# Allegro board Mic_Array_main_250pcs_release_updated.brd
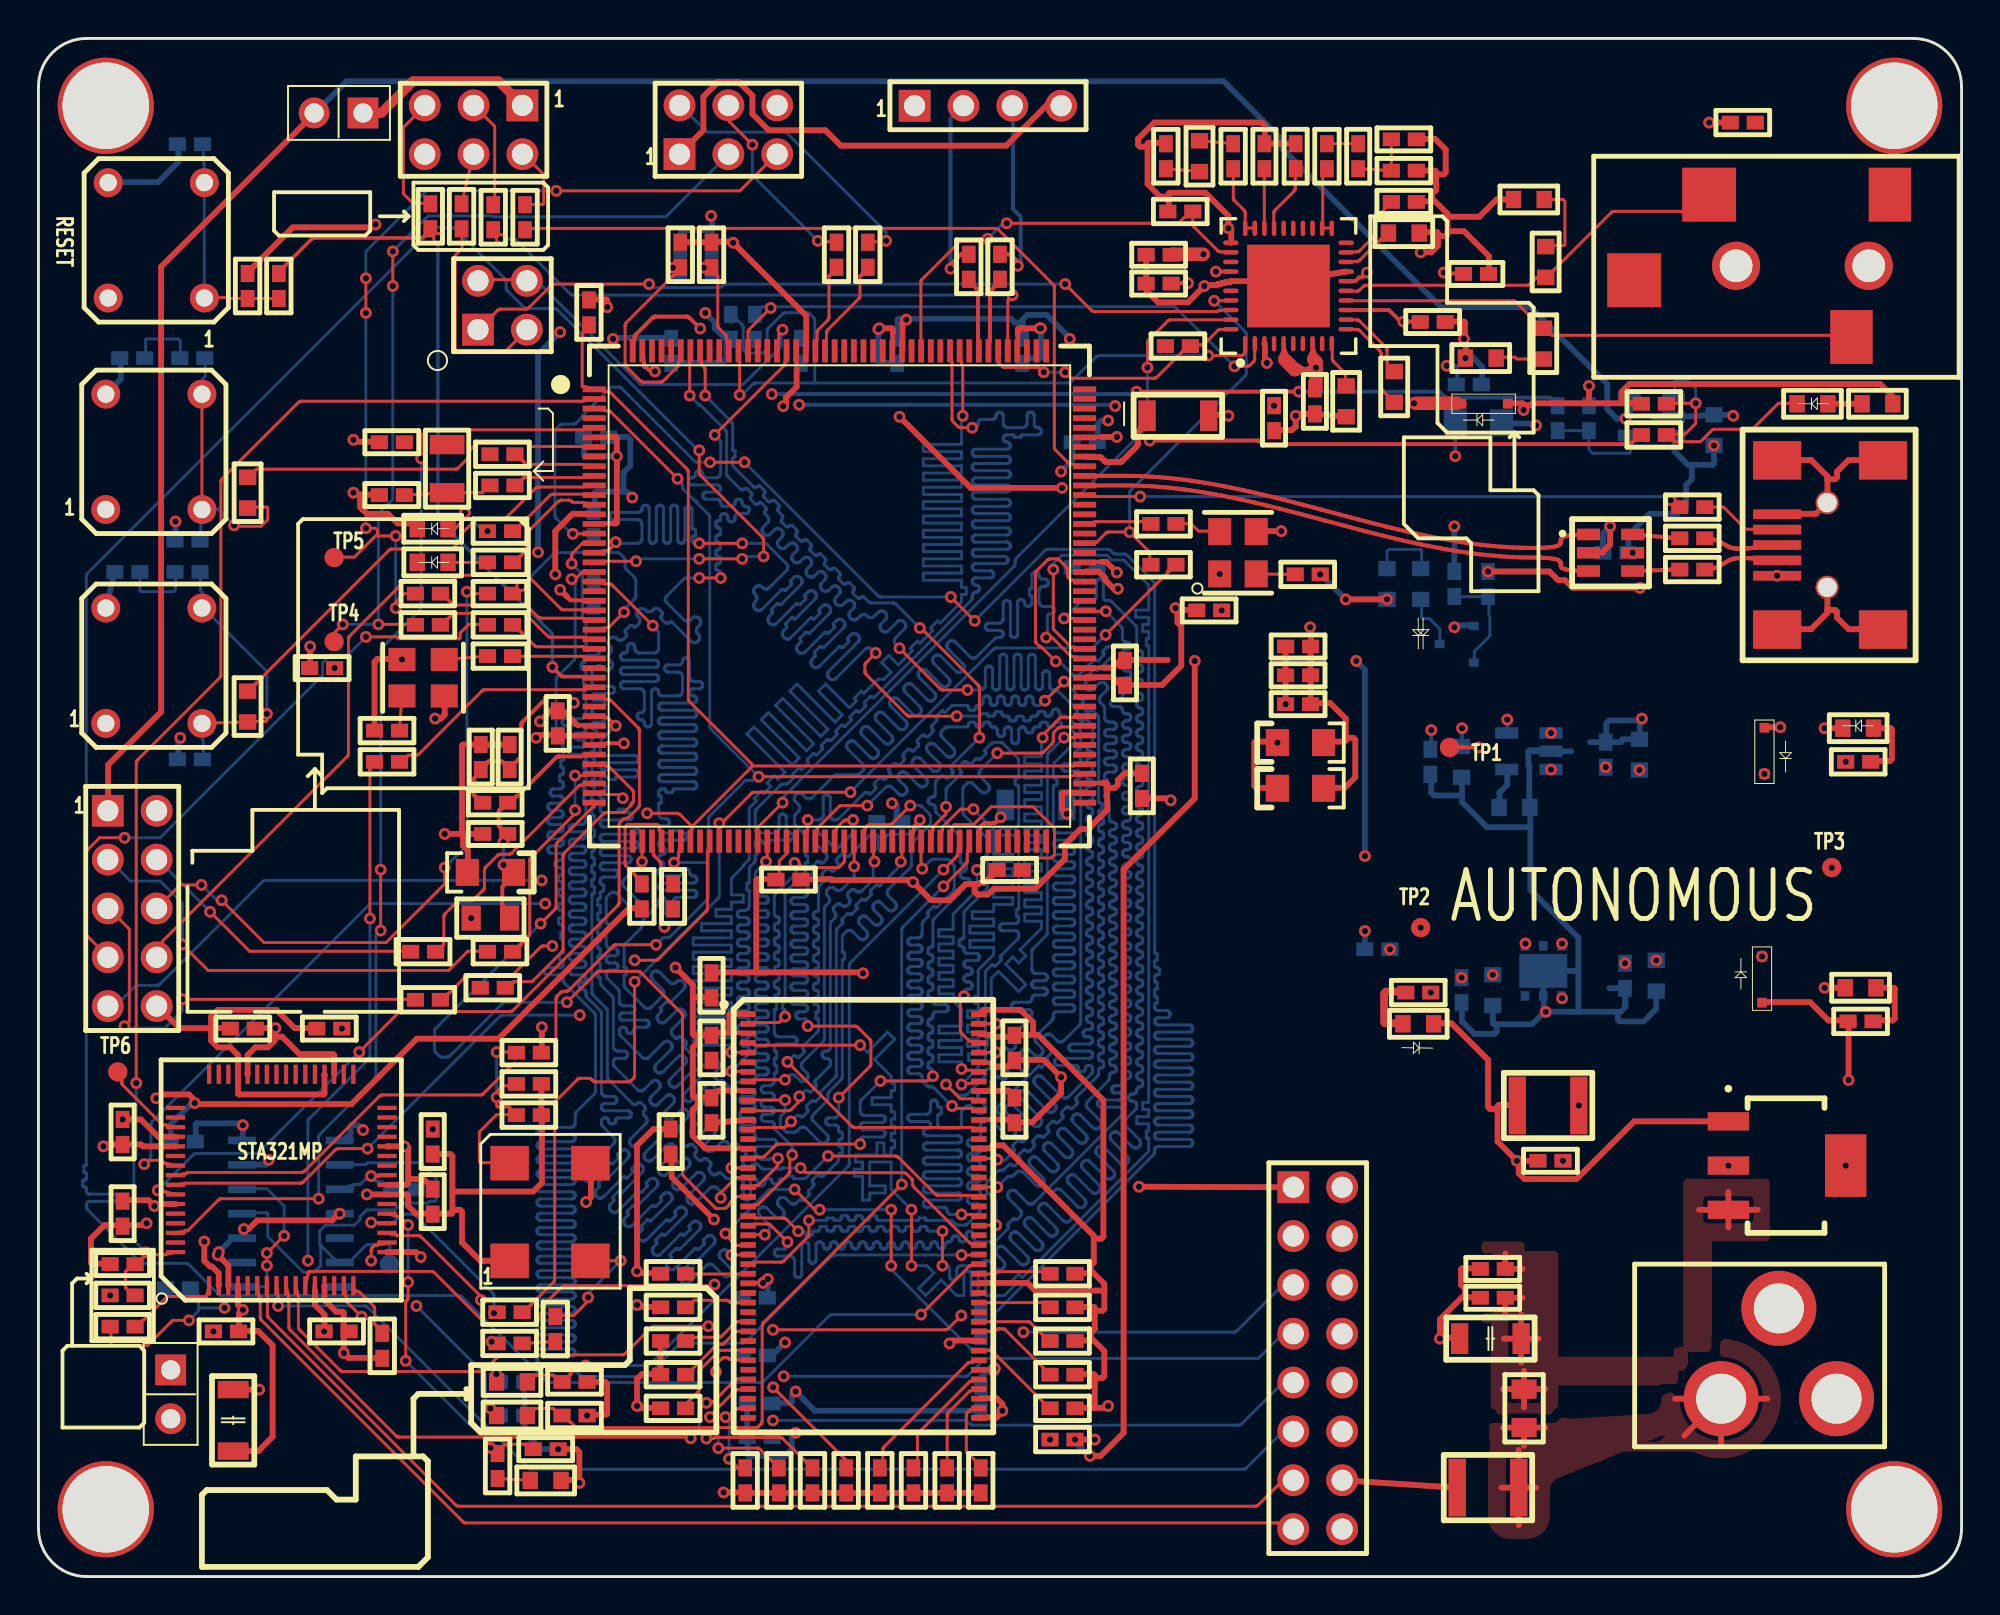
[diagram p0: board, top side]
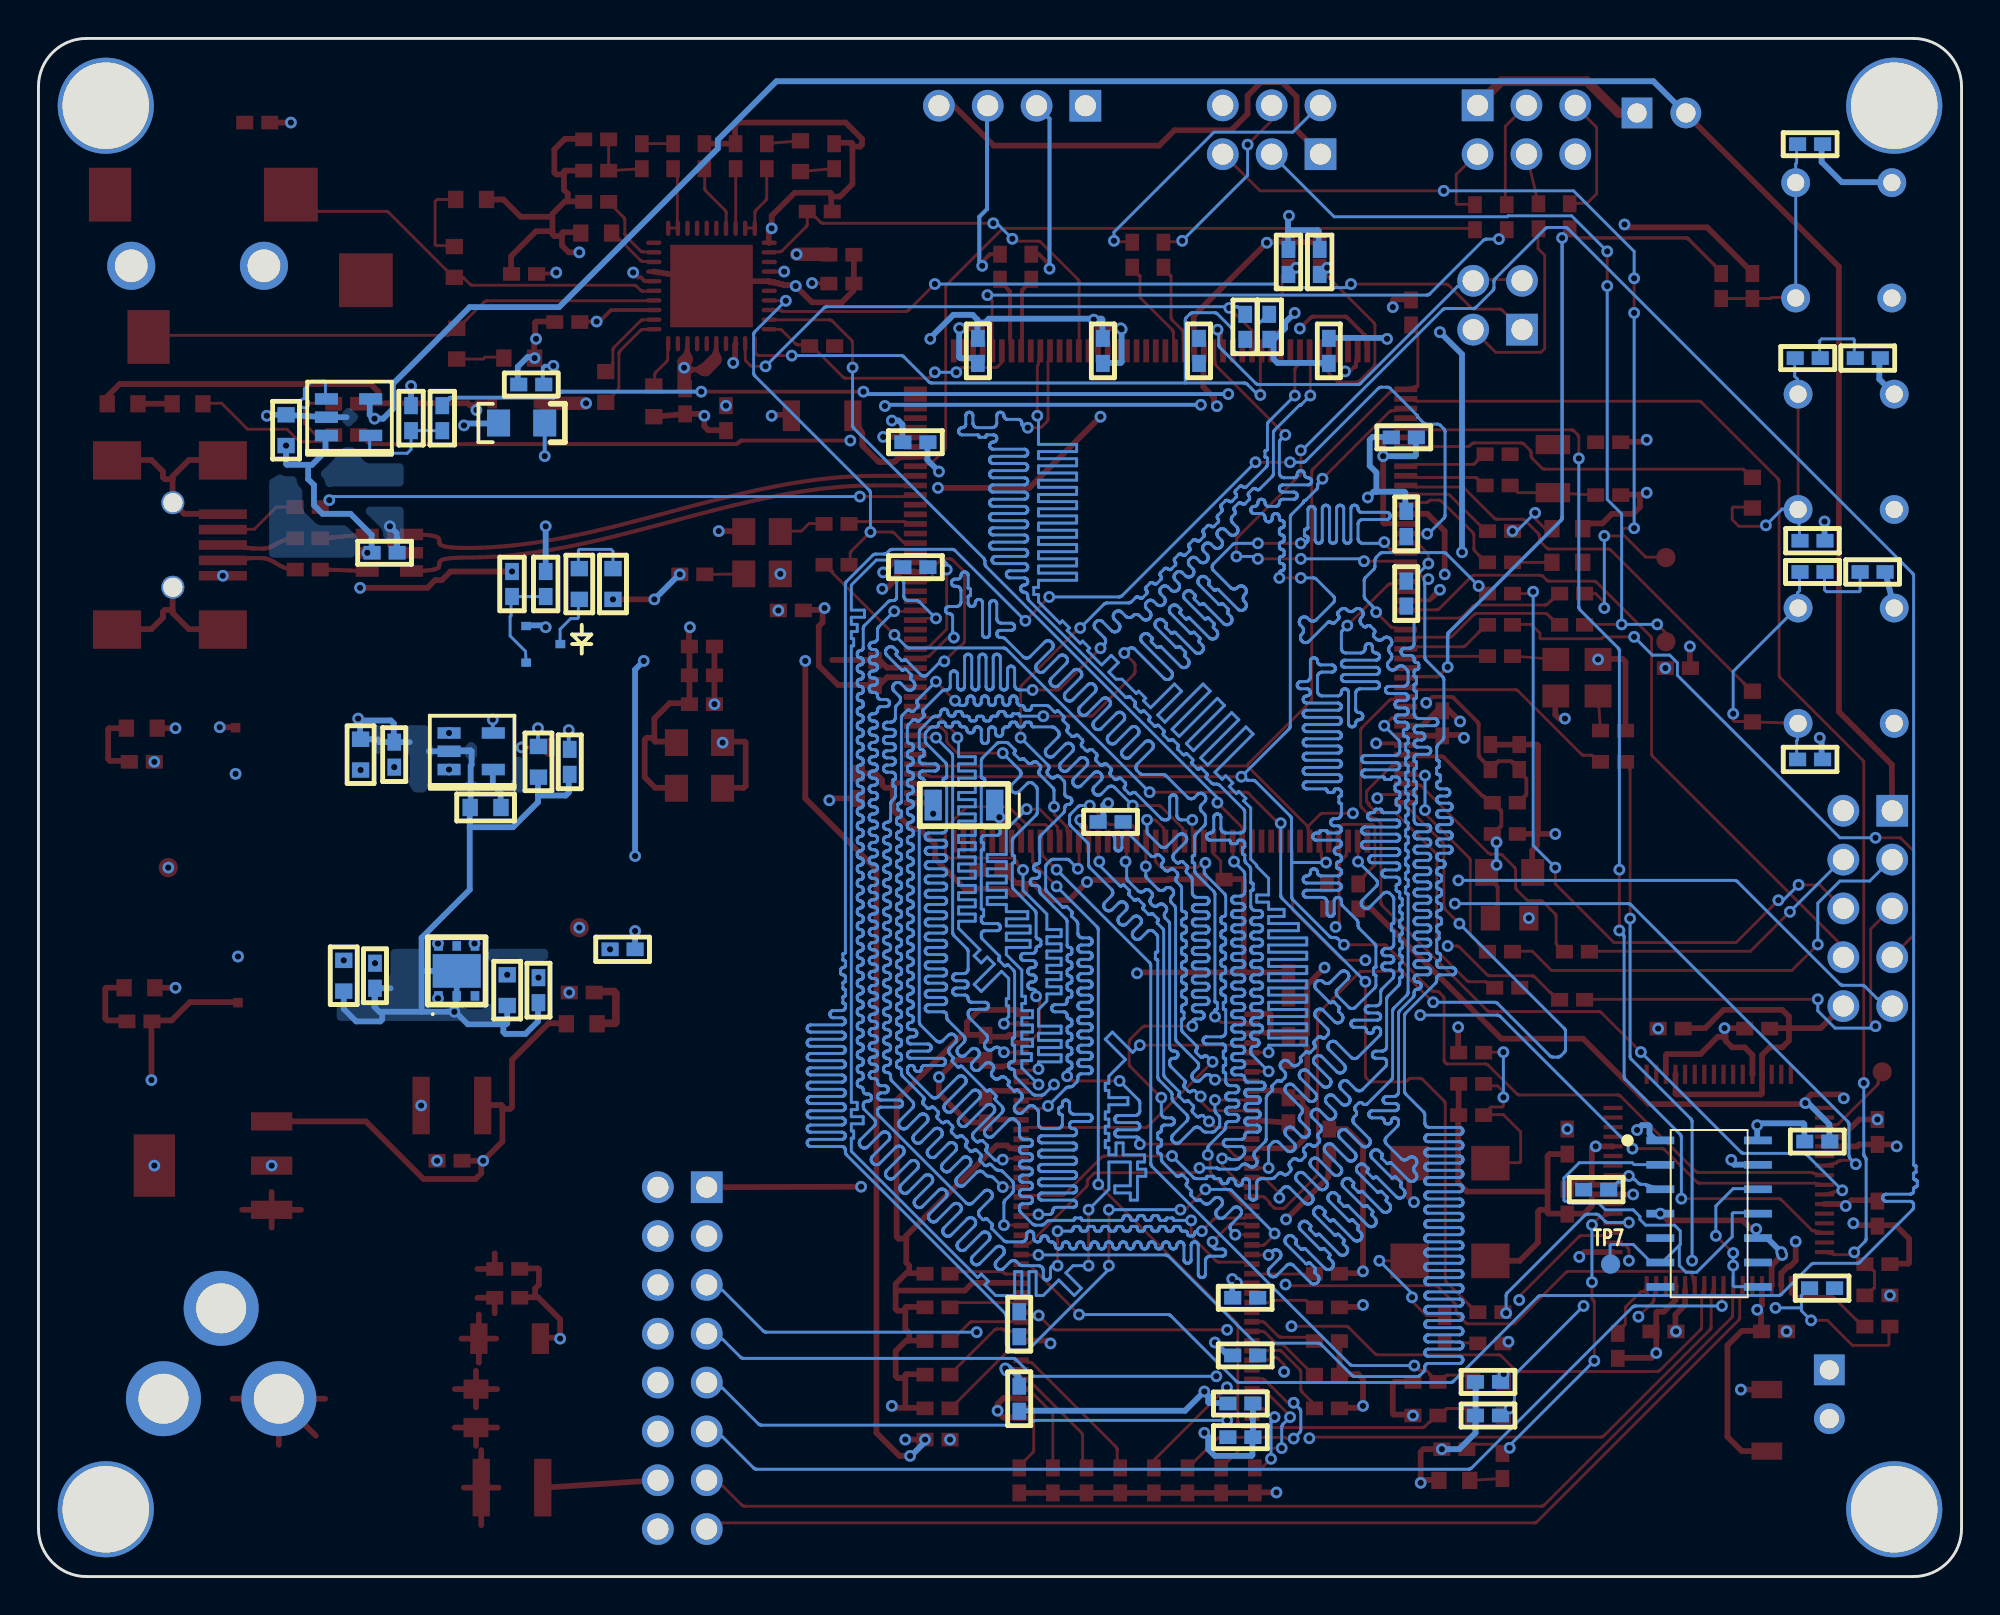
[diagram p1: board, bottom side, seen from below]

Outline 100 x 80 mm; copper layers: TOP, INT_LAYER2, INT_LAYER3, BOTTOM. Coordinates in mm from the lower left corner of the outline.

## Design rules (mm)
constraint set DEFAULT: min track width 0.1
net group PWR_SIGNAL: nets VDDA VREF
net group SDRAM_ADDRESS: nets FMC_A10 FMC_SDCLK
net group UART_DIFF: nets UART4_RX UART4_TX
net group USB_DIFF: nets USB_FS1_N USB_FS1_P
net group USB_OTG_FS: nets USB_OTG_FS_DM USB_OTG_FS_DP
net group SDRAM_DATA: nets FMC_D0 FMC_D1 FMC_D2 FMC_D3 FMC_D4 FMC_D5 FMC_D6 FMC_D7 FMC_D8 FMC_D9 FMC_D10 FMC_D11 FMC_D12 FMC_D13 FMC_D14 FMC_D15
nets with their own width: min track width 0.14; nets OSC25M OSC32_IN OSC32_OUT
nets with their own width: min track width 0.18; nets NRST
nets with their own width: nets OTG_FS_OVERCURRENT OTG_FS_POWERSWITCHON

## Placement (name value [footprint] x y rotation side)
C1  100nF_0402  [CAP_SMD_0402]  7.75 52.25 0 bottom
C2  10pF_0603  [CAP_SMD_0402]  24.62 10.12 0 bottom
C3  10pF_0603  [CAP_SMD_0402]  24.62 8.38 180 bottom
C4  100nF_0402  [CAP_SMD_0402]  8 63.38 0 bottom
C5  100nF_0402  [CAP_SMD_0402]  7.88 74.5 180 bottom
C7  1uF_0603  [CAP_SMD_0603]  83.25 42.75 90 bottom
C8  1uF_0603  [CAP_SMD_0603]  74 42.38 270 bottom
C9  100nF_0402  [CAP_SMD_0402]  81.5 42.75 90 bottom
C10  10nF_0603  [CAP_SMD_0603]  76.75 40 0 bottom
C11  100nF_0402  [CAP_SMD_0402]  72.38 42.38 270 bottom
C12  1uF_0603  [CAP_SMD_0603]  84.12 31.25 270 bottom
C13  100nF_0402  [CAP_SMD_0402]  74 30.5 270 bottom
C14  4.7uF_0603  [CAP_SMD_0603]  87.12 59.62 90 bottom
C15  100nF_0402  [CAP_SMD_0402]  82.5 31.25 270 bottom
C16  1uF_0603  [CAP_SMD_0603]  75.62 30.5 270 bottom
C17  100nF_0402  [CAP_SMD_0402]  82 53.25 0 bottom
C18  330uF_1210  [CAP_SMD_1210]  75.38 4.62 180 top
C19  150uF_1206  [CAP_SMD_1206]  75.5 12.38 180 top
C20  0.1uF_0402  [CAP_SMD_0402]  75.62 16 180 top
C21  10uF_0402  [CAP_SMD_0402]  75.62 14.5 180 top
C22  0.1uF_0402  [CAP_SMD_0402]  78.62 21.62 180 top
C23  22uF_1210  [CAP_SMD_1210]  78.5 24.5 180 top
C24  4.7pF 0402  [CAP_SMD_0402]  18.38 59 0 top
C25  4.7pF 0402  [CAP_SMD_0402]  18.38 56.25 0 top
C26  100nF_0402  [CAP_SMD_0402]  14.75 47.25 0 top
C27  100nF_0402  [CAP_SMD_0402]  65.5 46.88 0 top
C28  100nF_0402  [CAP_SMD_0402]  65.5 48.38 0 top
C29  100nF_0402  [CAP_SMD_0402]  65.5 45.38 0 top
C30  100nF_0402  [CAP_SMD_0402]  44.25 39.25 180 bottom
C31  100nF_0402  [CAP_SMD_0402]  32.9 63.75 90 bottom
C32  100nF_0402  [CAP_SMD_0402]  39.65 63.75 90 bottom
C33  100nF_0402  [CAP_SMD_0402]  28.88 54.75 90 bottom
C34  100nF_0402  [CAP_SMD_0402]  27 44.38 270 top
C35  100nF_0402  [CAP_SMD_0402]  28.88 51.12 90 bottom
C36  100nF_0402  [CAP_SMD_0402]  29 59.25 0 bottom
C37  100nF_0402  [CAP_SMD_0402]  44.65 63.75 90 bottom
C38  100nF_0402  [CAP_SMD_0402]  39 36.25 180 top
C39  100nF_0402  [CAP_SMD_0402]  50.5 36.75 0 top
C40  100nF_0402  [CAP_SMD_0402]  51.15 63.75 90 bottom
C41  100nF_0402  [CAP_SMD_0402]  33 35.38 270 top
C42  100nF_0402  [CAP_SMD_0402]  57.38 41.12 270 top
C43  100nF_0402  [CAP_SMD_0402]  56.5 47 270 top
C44  100nF_0402  [CAP_SMD_0402]  54.4 52.5 0 bottom
C45  100nF_0402  [CAP_SMD_0402]  54.4 59 0 bottom
C46  2.2uF  [CAP_SMD_1206]  59.25 60.38 0 top
C47  2.2uF  [CAP_SMD_1206]  51.88 40.12 180 bottom
C48  4.7uF  [CAP_SMD_1206_TANTALUM]  65.62 43.38 0 top
C49  4.7uF  [CAP_SMD_1206_TANTALUM]  65.62 41 0 top
C50  1uF  [CAP_SMD_1206_TANTALUM]  23.5 36.62 180 top
C51  100nF_0402  [CAP_SMD_0402]  23.75 38.62 0 top
C52  100nF_0402  [CAP_SMD_0402]  24.5 42.62 90 top
C53  100nF_0402  [CAP_SMD_0402]  23 42.62 90 top
C54  0.022uF_0603  [CAP_SMD_0603]  78.25 64.12 90 top
C55  0.022uF_0603  [CAP_SMD_0603]  78.38 68.38 270 top
C56  0.1uF_0402  [CAP_SMD_0402]  64.25 60.25 90 top
C57  0.1uF_0402  [CAP_SMD_0402]  66.38 61.12 90 top
C58  1uF_0603  [CAP_SMD_0603]  68 61.12 270 top
C59  1uF_0603  [CAP_SMD_0603]  70.5 61.88 90 top
C60  1uF_0603  [CAP_SMD_0603]  60.38 73.88 270 top
C61  10nF_ 0402  [CAP_SMD_0402]  71 74.75 180 top
C62  0.1uF_0402  [CAP_SMD_0402]  58.25 67.25 180 top
C63  0.1uF_0402  [CAP_SMD_0402]  74.75 67.75 0 top
C64  1uF_typeA  [CAP_SMD_1206_TANTALUM]  74.88 60 0 bottom
C65  0.1uF_0402  [CAP_SMD_0402]  72.5 65.25 0 top
C66  0.1uF_0402  [CAP_SMD_0402]  74.38 62 0 bottom
C67  0.1uF_0402  [CAP_SMD_0402]  68.62 73.88 270 top
C68  0.1uF_0402  [CAP_SMD_0402]  58.25 68.75 180 top
C69  100nF_0402  [CAP_SMD_0402]  35 27.5 90 top
C70  100nF_0402  [CAP_SMD_0402]  37.5 7.25 180 bottom
C71  100nF_0402  [CAP_SMD_0402]  37.5 9 180 bottom
C72  1uF_0603  [CAP_SMD_0603]  71 69.88 0 top
C73  150pF_0402  [CAP_SMD_0402]  65.38 73.88 90 top
C74  150pF_0402  [CAP_SMD_0402]  63.75 73.88 90 top
C75  1uF_0402  [CAP_SMD_0402]  71 71.5 0 top
C76  100nF_0402  [CAP_SMD_0402]  37.25 11.5 0 bottom
C77  100nF_0402  [CAP_SMD_0402]  37.25 14.5 0 bottom
C78  100nF_0402  [CAP_SMD_0402]  49 9.25 90 bottom
C79  100nF_0402  [CAP_SMD_0402]  49 13.12 90 bottom
C80  100nF_0402  [CAP_SMD_0402]  35 30.75 270 top
C81  100nF_0402  [CAP_SMD_0402]  50.75 27.5 270 top
C82  100nF_0402  [CAP_SMD_0402]  35 24.25 90 top
C83  100nF_0402  [CAP_SMD_0402]  32.88 22.62 270 top
C84  100nF_0402  [CAP_SMD_0402]  50.75 24.25 270 top
C85  100nF_0402  [CAP_SMD_0402]  9.75 12.75 0 top
C86  100nF_0402  [CAP_SMD_0402]  15.12 28.5 0 top
C87  100nF_0402  [CAP_SMD_0402]  20.5 19.5 90 top
C88  100nF_0402  [CAP_SMD_0402]  20.5 22.62 90 top
C89  1nF_0402  [CAP_SMD_0402]  4.38 16.25 180 top
C90  100nF_0402  [CAP_SMD_0402]  10.62 28.5 0 top
C91  100nF_0402  [CAP_SMD_0402]  4.38 23.12 90 top
C92  100nF_0402  [CAP_SMD_0402]  4.38 18.88 90 top
C93  100nF_0402  [CAP_SMD_0402]  15.5 12.75 0 top
C100  10uF_6.3V_1206  [CAP_SMD_1206]  10.12 8.12 270 top
C101  0.01uF_0603  [CAP_SMD_0402]  60.88 50.25 0 top
C102  100nF_0402  [CAP_SMD_0402]  7.5 22.62 0 bottom
C103  100nF_0402  [CAP_SMD_0402]  26.38 6.62 180 top
C104  1nF_0603  [CAP_SMD_0603]  26.38 5 180 top
CN1  JACK 3.5MM  [AUDIO_JACK_35]  86.88 71.88 180 top
D1  LED,red  [LED_SMD_0603]  92.25 61 0 top
D2  LED, green  [LED_SMD_0603]  71.75 28.75 180 top
D3  LED, green  [LED_SMD_0603]  94.75 30.62 0 top
D4  BAT60JFILM  [DIOD_SOD323]  89.75 41.75 90 top
D5  LED, green  [LED_SMD_0603]  71.88 51.62 90 bottom
D6  LED, green  [LED_SMD_0603]  94.62 44.12 0 top
D7  BAT60JFILM  [DIOD_SOD323]  89.62 32.25 270 top
D8  LED, green  [LED_SMD_0603]  20.5 54.5 0 top
D9  LED, green  [LED_SMD_0603]  20.5 52.75 0 top
D10  BAT60JFILM  [DIOD_SOD323]  74 61 0 top
J1  CONN_10POS  [10PINDUALMALEHEADER]  3.6 39.83 270 top
J2  HEADER 6  [6PINDUALMALEHEADER]  25.16 76.52 180 top
J3  CONN_4POS  [4PINFEMALEHEADER]  45.56 76.5 0 top
J5  HEADER 6  [6PINDUALMALEHEADER]  33.34 73.98 0 top
J6  IDC_16_2.54mm  [16PINDUALMALEHEADER]  65.25 20.25 270 top
JP1  JUMPER  [J1_2_254]  6.88 10.75 270 top
JP2  JUMPER2  [4PINDUALMALEHEADER]  22.86 64.86 0 top
JP3  JUMPER_2  [J1_2_254]  16.88 76.12 180 top
L1  1uH  [IN_SMD_0805_2]  77.25 8.75 90 top
L2  FCM1608KF-601T03  [IN_SMD_0805_2]  23.5 34.25 0 top
NOREF  -  [unnamed]  0 0 0 top
NOREF#2  -  [#2]  54.65 38 90 top
Q1  9013-SOT23  [SOT23]  73.75 48.5 180 bottom
R1  22_0402  [RES_SMD_0402]  25.3 70.7 270 top
R2  22_0402  [RES_SMD_0402]  23.65 70.7 270 top
R3  100_0402  [RES_SMD_0402]  4.62 52.25 180 bottom
R4  22_0402  [RES_SMD_0402]  22 70.75 270 top
R5  22_0402  [RES_SMD_0402]  20.38 70.75 270 top
R7  330_0603  [RES_SMD_0603]  10.88 45.25 270 top
R8  100_0402  [RES_SMD_0402]  50 68.12 90 top
R9  220K_0402  [RES_SMD_0402]  7.88 42.5 180 bottom
R10  100_0402  [RES_SMD_0402]  48.38 68.12 90 top
R11  100_0402  [RES_SMD_0402]  4.88 63.38 180 bottom
R12  100_0603  [RES_SMD_0603]  24.62 10.12 180 top
R13  100_0603  [RES_SMD_0603]  24.62 8.38 0 top
R14  100K_0402  [RES_SMD_0402]  10.88 67.12 270 top
R16  0_0402  [RES_SMD_0402]  12.5 67.12 270 top
R18  330_0603  [RES_SMD_0603]  10.88 56.38 270 top
R19  220K_0402  [RES_SMD_0402]  7.75 53.88 180 bottom
R20  620_0603  [RES_SMD_0603]  95.62 61 180 top
R21  47K_0402  [RES_SMD_0402]  84 61 0 top
R22  10K_0402  [RES_SMD_0402]  80.62 60.25 270 bottom
R23  0_0402  [RES_SMD_0402]  84 59.38 180 top
R24  1K_0402  [RES_SMD_0402]  71.75 30.38 0 top
R25  0_0402  [RES_SMD_0402]  79 60.25 270 bottom
R26  22_0402  [RES_SMD_0402]  86 52.38 180 top
R27  22_0402  [RES_SMD_0402]  86 54 180 top
R28  0_0402  [RES_SMD_0402]  86 55.62 180 top
R29  1K_0402  [RES_SMD_0402]  94.75 28.88 180 top
R30  47K_0402  [RES_SMD_0402]  75.38 51.62 270 bottom
R31  330 _0603  [RES_SMD_0603]  70.12 51.62 90 bottom
R32  1K_0402  [RES_SMD_0402]  94.62 42.38 180 top
R33  100K_0402  [RES_SMD_0402]  73.62 51.62 270 bottom
R34  0  [RES_SMD_0402]  24.12 58.38 0 top
R35  0  [RES_SMD_0402]  24.12 56.75 0 top
R36  10K_0402  [RES_SMD_0402]  18.12 44 0 top
R37  0  [RES_SMD_0402]  23.62 30.62 0 top
R40  0  [RES_SMD_0402]  24 32.5 0 top
R41  0  [RES_SMD_0402]  20 32.5 0 top
R43  0  [RES_SMD_0402]  20.25 30 0 top
R44  100  [RES_SMD_0402]  43.12 68.75 90 top
R46  100  [RES_SMD_0402]  41.5 68.75 90 top
R49  100_0402  [RES_SMD_0402]  24 47.88 0 top
R52  10K_ 0402  [RES_SMD_0402]  35 68.75 90 top
R53  N.A  [RES_SMD_0402]  35 68.38 90 bottom
R54  100_0402  [RES_SMD_0402]  20.25 51.12 180 top
R55  10K_0402  [RES_SMD_0402]  31.38 35.38 270 top
R56  100_0402  [RES_SMD_0402]  20.25 49.5 180 top
R57  NA  [RES_SMD_0402]  33.38 68.75 90 top
R59  10K_0402  [RES_SMD_0402]  33.38 68.38 90 bottom
R61  0  [RES_SMD_0402]  24 51.12 180 top
R63  0  [RES_SMD_0402]  24 49.5 180 top
R64  1K  [RES_SMD_0402]  24 54.38 0 top
R65  1K  [RES_SMD_0402]  24 52.75 0 top
R66  0  [RES_SMD_0402]  69.62 32.62 0 bottom
R67  0  [RES_SMD_0402]  23.75 40.25 0 top
R68  100K_0402  [RES_SMD_0402]  53.25 14 180 top
R69  10K_0402  [RES_SMD_0402]  53.25 12.25 180 top
R70  10K_0402  [RES_SMD_0402]  53.25 10.5 180 top
R71  10K_0402  [RES_SMD_0402]  53.25 8.75 180 top
R72  10K_0402  [RES_SMD_0402]  43.75 5 90 top
R73  10K_0402  [RES_SMD_0402]  45.5 5 90 top
R74  10K_0402  [RES_SMD_0402]  47.25 5 90 top
R75  51_0603  [RES_SMD_0603]  75 63.38 0 top
R76  51_0603  [RES_SMD_0603]  77.5 71.62 0 top
R77  10K_0402  [RES_SMD_0402]  49 5 90 top
R78  10K_0402  [RES_SMD_0402]  36.75 5 90 top
R79  10K_0402  [RES_SMD_0402]  38.5 5 90 top
R80  10K_0402  [RES_SMD_0402]  40.25 5 90 top
R81  10K_0402  [RES_SMD_0402]  42 5 90 top
R82  10K_0402  [RES_SMD_0402]  33 8.75 0 top
R83  10K_0402  [RES_SMD_0402]  33 10.5 0 top
R84  0_0402  [RES_SMD_0402]  88.62 75.62 0 top
R85  10K_0402  [RES_SMD_0402]  33 12.25 0 top
R86  10K_0402  [RES_SMD_0402]  33 14 0 top
R87  10K_0402  [RES_SMD_0402]  59.38 71 0 top
R88  100_0402  [RES_SMD_0402]  62.12 73.88 90 top
R89  0_0402  [RES_SMD_0402]  59.25 64 0 top
R90  100K_0402  [RES_SMD_0402]  53.25 15.75 0 top
R91  100K_0402  [RES_SMD_0402]  33 15.75 180 top
R92  100K_0402  [RES_SMD_0402]  58.62 73.88 90 top
R93  100K_0402  [RES_SMD_0402]  71 73.12 0 top
R94  100K_0402  [RES_SMD_0402]  67 73.88 90 top
R95  N.A 0  [RES_SMD_0402]  58.5 52.62 0 top
R96  10K_0402  [RES_SMD_0402]  4.38 14.62 0 top
R97  2K7_0402  [RES_SMD_0402]  37.25 65 270 bottom
R98  2K7_0402  [RES_SMD_0402]  36 65 270 bottom
R99  10K_0402  [RES_SMD_0402]  25.5 24 180 top
R100  100_0402  [RES_SMD_0402]  26.88 12.88 270 top
R101  0R0_0402(N.A)  [RES_SMD_0402]  25.5 27.25 0 top
R102  0R0_0402  [RES_SMD_0402]  25.5 25.62 0 top
R103  0R0_0402(NA)  [RES_SMD_0402]  24.5 12.12 0 top
R104  0R0_0402  [RES_SMD_0402]  24.5 13.75 0 top
R105  0R0_0402(NA)  [RES_SMD_0402]  4.38 13 180 top
R106  0R0_0402(NA)  [RES_SMD_0402]  7.25 15 180 bottom
R107  0R0_0402  [RES_SMD_0402]  19 20.12 0 bottom
R110  0_0603  [RES_SMD_0402]  53.25 7.12 0 top
R111  10K_0402  [RES_SMD_0402]  66 52.12 180 top
R112  3K3_0402  [RES_SMD_0402]  23.88 5.75 90 top
R114  0R0_0402  [RES_SMD_0402]  17.88 12 90 top
R115  100_0402  [RES_SMD_0402]  58.5 54.75 180 top
R116  2K7_0402  [RES_SMD_0402]  27.88 10.12 0 top
R117  2K7_0402  [RES_SMD_0402]  27.88 8.38 0 top
R118  0  [RES_SMD_0402]  18.12 42.38 180 top
R119  10k_0402(NA)  [RES_SMD_0402]  28.62 65.75 270 top
SW1  SW-BLACK  [PUSHBUTTON_4_09]  6 47.38 90 top
SW2  SW-BLACK  [PUSHBUTTON_4_09]  6 58.5 90 top
SW3  SW-BLACK  [PUSHBUTTON_4_09]  6.12 69.5 270 top
TP1  TEST POINT  [TEST_PAD1]  73.38 43.12 0 top
TP2  TEST POINT  [TEST_PAD1]  71.88 33.75 0 top
TP3  TEST POINT  [TEST_PAD1]  93.25 36.88 0 top
TP4  TEST POINT  [TEST_PAD1]  15.38 48.62 0 top
TP5  TEST POINT  [TEST_PAD1]  15.38 53 0 top
TP6  TEST POINT  [TEST_PAD1]  4.12 26.25 0 top
TP7  TEST POINT  [TEST_PAD1]  18.25 16.25 180 bottom
U1  LD3985M25R  [SOT235L]  77.5 42.88 90 bottom
U2  LD39050PU33R  [DFN6_6_3X3]  78.25 31.5 180 bottom
U4  Mini USB Type B  [MINI_USB]  93.01 53.65 90 top
U5  USBLC6-2  [SOT23_6L]  81.75 53.25 270 top
U6  PJ-202A  [DC-JACK]  87.5 9.25 270 top
U7  LT1117IST-5PBF  [SOT_223]  90.88 21.38 270 top
U8  STM32F746IGT6  [LQFP_176_24X24]  41.65 51 0 top
U9  CS43L22  [QFN_40_6X6]  65 67.12 90 top
U10  MT48LC4M32B2  [TSOPII_86_22X12]  42.9 18.75 0 top
U11  STMPS2141STR  [SOT235L]  83.88 60.25 90 bottom
U12  STA321MPL  [STA321]  8.88 15.62 0 top
U14  -  [74VHC74]  13.12 18.88 180 bottom
X1  NX3215SA-32.768K  [XTAL_32MHZ]  21.25 57.62 90 top
X2  OSC MEMS 25Mhz CMOS SMD  [OSC14REC12]  20 46.75 0 top
X3  OSC 12.2888MHZ  [OSC14REC12]  62.38 53.25 90 top
X4  OSC 12.2888MHZ  [OSC112896]  24.5 21.5 270 top

## Library data of the parts
C1-C5 C7-C17 C20-C47 C51-C53 C85-C93 C101-C104 = CAPACITOR NON-POL
C18 C19 = C
C48-C50 C64 C100 = CAPACITOR POL_0
C54-C63 C65-C84 = CAP NP
CN1 = ST-225-02_3
D1-D3 D5 D6 D8 D9 = LED
D4 D7 D10 = DIODE
J1 = HEADER 5X2
J2 J5 = HEADER 6_0
J3 = 4 HEADER
J6 = CON16A
JP1 JP3 = JUMPER_2
JP2 = JUMPER2
L1 = INDUCTOR
L2 = L
Q1 = PN2222
R1-R5 R7-R11 R14 R16 R18-R37 R40 R41 R43 R44 R46 R49 R53-R57 R59 R61 R63-R74 R77-R83 R85 R86 R90 R91 R95 R97 R98 R110 R111 R115-R119 = R2
R12 R13 R75 R76 R84 R87-R89 R92-R94 R96 R99-R107 R112 R114 = R
R52 = R2_0
SW1 = SW PUSHBUTTON-SPST-2/SM_1
SW2 = SW PUSHBUTTON-SPST-2/SM_2
SW3 = SW PUSHBUTTON-SPST-2/SM_0
TP1-TP7 = TEST POINT
U1 = LD3985M33R_2
U2 = LD39050PU33R_1
U4 = USB_7
U5 = USBLC6-2_4
U6 = DC JACK: User Part Number: ***
U7 = LT1117IST-5PBF_1
U8 = STM32F746xxx_15
U9 = 40L QFN_2
U10 = SDRAM-MT48LC4M32B2_0
U11 = STMPS2141STR_2
U12 = STA321MPL_0
U14 = 7474_0
X1 = QZS32768
X2 X3 = OSC4/SM_2
X4 = XTAL_0

## Footprints (pads in the part's own frame, mm; a bottom-side part is the same pattern mirrored in y, then rotated)
4PINDUALMALEHEADER
  rect 1.65x1.65 hole 1.1: 1(0,0)
  round 1.65 hole 1.1: 2(0,2.54) 3(2.54,0) 4(2.54,2.54)
4PINFEMALEHEADER
  rect 1.65x1.65 hole 1.1: 1(0,0)
  round 1.65 hole 1.1: 2(2.54,0) 3(5.08,0) 4(7.62,0)
6PINDUALMALEHEADER
  rect 1.65x1.65 hole 1.1: 1(0,0)
  round 1.65 hole 1.1: 2(0,2.54) 3(2.54,0) 4(2.54,2.54) 5(5.08,0) 6(5.08,2.54)
10PINDUALMALEHEADER
  rect 1.65x1.65 hole 1.1: 1(0,0)
  round 1.65 hole 1.1: 2(0,2.54) 3(2.54,0) 4(2.54,2.54) 5(5.08,0) 6(5.08,2.54) 7(7.62,0) 8(7.62,2.54) 9(10.16,0) 10(10.16,2.54)
16PINDUALMALEHEADER
  rect 1.65x1.65 hole 1.1: 1(0,0)
  round 1.65 hole 1.1: 2(0,2.54) 3(2.54,0) 4(2.54,2.54) 5(5.08,0) 6(5.08,2.54) 7(7.62,0) 8(7.62,2.54) 9(10.16,0) 10(10.16,2.54) 11(12.7,0) 12(12.7,2.54) 13(15.24,0) 14(15.24,2.54) 15(17.78,0) 16(17.78,2.54)
74VHC74
  rect 1.45x0.4 smd: 1(-2.54,3.81) 2(-2.54,2.54) 3(-2.54,1.27) 4(-2.54,0) 5(-2.54,-1.27) 6(-2.54,-2.54) 7(-2.54,-3.81) 8(2.54,-3.81) 9(2.54,-2.54) 10(2.54,-1.27) 11(2.54,0) 12(2.54,1.27) 13(2.54,2.54) 14(2.54,3.81)
AUDIO_JACK_35
  round 2.5 hole 1.7 unplated: (-8.3,3.7) (-1.4,3.7)
  rect 2.2x2.8 smd: 1(-9.4,0) 3(-7.4,7.4)
  rect 2.8x2.8 smd: 2(0,0) 4(3.9,4.45)
CAP_SMD_0402
  rect 0.889x0.711 smd: 1(-0.65,0) 2(0.65,0)
CAP_SMD_0603
  rect 0.8x0.9 smd: 1(-0.8,0) 2(0.8,0)
CAP_SMD_1206
  rect 0.9x1.6 smd: 1(-1.6,0) 2(1.6,0)
CAP_SMD_1206_TANTALUM
  rect 1.2x1.4 smd: 1(-1.2,0) 2(1.2,0)
CAP_SMD_1210
  rect 0.9x3 smd: 1(-1.6,0) 2(1.6,0)
DC-JACK
  round 3.9 hole 2.6: 1(0,0) 2(0,6) 3(-4.7,3)
DFN6_6_3X3
  rect 0.45x0.5 smd: 1(-0.95,-1.3) 2(0,-1.3) 3(0.95,-1.3) 4(0.95,1.3) 5(0,1.3) 6(-0.95,1.3)
  rect 2.5x1.75 smd: 7(0,0)
DIOD_SOD323
  rect 0.5x0.5 smd: 1(0,0) 2(2.4,0)
IN_SMD_0805_2
  rect 1x1.3 smd: 1(-1,0) 2(1,0)
J1_2_254
  rect 1.6x1.6 hole 1: 1(0,0)
  round 1.6 hole 1: 2(2.54,0)
LED_SMD_0603
  rect 0.8x0.9 smd: 1(-0.8,0) 2(0.8,0)
LQFP_176_24X24
  rect 1.2x0.3 smd: 1(-12.75,10.75) 2(-12.75,10.25) 3(-12.75,9.75) 4(-12.75,9.25) 5(-12.75,8.75) 6(-12.75,8.25) 7(-12.75,7.75) 8(-12.75,7.25) 9(-12.75,6.75) 10(-12.75,6.25) 11(-12.75,5.75) 12(-12.75,5.25) 13(-12.75,4.75) 14(-12.75,4.25) 15(-12.75,3.75) 16(-12.75,3.25) 17(-12.75,2.75) 18(-12.75,2.25) 19(-12.75,1.75) 20(-12.75,1.25) 21(-12.75,0.75) 22(-12.75,0.25) 23(-12.75,-0.25) 24(-12.75,-0.75) 25(-12.75,-1.25) 26(-12.75,-1.75) 27(-12.75,-2.25) 28(-12.75,-2.75) 29(-12.75,-3.25) 30(-12.75,-3.75) 31(-12.75,-4.25) 32(-12.75,-4.75) 33(-12.75,-5.25) 34(-12.75,-5.75) 35(-12.75,-6.25) 36(-12.75,-6.75) 37(-12.75,-7.25) 38(-12.75,-7.75) 39(-12.75,-8.25) 40(-12.75,-8.75) 41(-12.75,-9.25) 42(-12.75,-9.75) 43(-12.75,-10.25) 44(-12.75,-10.75) 89(12.75,-10.75) 90(12.75,-10.25) 91(12.75,-9.75) 92(12.75,-9.25) 93(12.75,-8.75) 94(12.75,-8.25) 95(12.75,-7.75) 96(12.75,-7.25) 97(12.75,-6.75) 98(12.75,-6.25) 99(12.75,-5.75) 100(12.75,-5.25) 101(12.75,-4.75) 102(12.75,-4.25) 103(12.75,-3.75) 104(12.75,-3.25) 105(12.75,-2.75) 106(12.75,-2.25) 107(12.75,-1.75) 108(12.75,-1.25) 109(12.75,-0.75) 110(12.75,-0.25) 111(12.75,0.25) 112(12.75,0.75) 113(12.75,1.25) 114(12.75,1.75) 115(12.75,2.25) 116(12.75,2.75) 117(12.75,3.25) 118(12.75,3.75) 119(12.75,4.25) 120(12.75,4.75) 121(12.75,5.25) 122(12.75,5.75) 123(12.75,6.25) 124(12.75,6.75) 125(12.75,7.25) 126(12.75,7.75) 127(12.75,8.25) 128(12.75,8.75) 129(12.75,9.25) 130(12.75,9.75) 131(12.75,10.25) 132(12.75,10.75)
  rect 0.3x1.2 smd: 45(-10.75,-12.75) 46(-10.25,-12.75) 47(-9.75,-12.75) 48(-9.25,-12.75) 49(-8.75,-12.75) 50(-8.25,-12.75) 51(-7.75,-12.75) 52(-7.25,-12.75) 53(-6.75,-12.75) 54(-6.25,-12.75) 55(-5.75,-12.75) 56(-5.25,-12.75) 57(-4.75,-12.75) 58(-4.25,-12.75) 59(-3.75,-12.75) 60(-3.25,-12.75) 61(-2.75,-12.75) 62(-2.25,-12.75) 63(-1.75,-12.75) 64(-1.25,-12.75) 65(-0.75,-12.75) 66(-0.25,-12.75) 67(0.25,-12.75) 68(0.75,-12.75) 69(1.25,-12.75) 70(1.75,-12.75) 71(2.25,-12.75) 72(2.75,-12.75) 73(3.25,-12.75) 74(3.75,-12.75) 75(4.25,-12.75) 76(4.75,-12.75) 77(5.25,-12.75) 78(5.75,-12.75) 79(6.25,-12.75) 80(6.75,-12.75) 81(7.25,-12.75) 82(7.75,-12.75) 83(8.25,-12.75) 84(8.75,-12.75) 85(9.25,-12.75) 86(9.75,-12.75) 87(10.25,-12.75) 88(10.75,-12.75) 133(10.75,12.75) 134(10.25,12.75) 135(9.75,12.75) 136(9.25,12.75) 137(8.75,12.75) 138(8.25,12.75) 139(7.75,12.75) 140(7.25,12.75) 141(6.75,12.75) 142(6.25,12.75) 143(5.75,12.75) 144(5.25,12.75) 145(4.75,12.75) 146(4.25,12.75) 147(3.75,12.75) 148(3.25,12.75) 149(2.75,12.75) 150(2.25,12.75) 151(1.75,12.75) 152(1.25,12.75) 153(0.75,12.75) 154(0.25,12.75) 155(-0.25,12.75) 156(-0.75,12.75) 157(-1.25,12.75) 158(-1.75,12.75) 159(-2.25,12.75) 160(-2.75,12.75) 161(-3.25,12.75) 162(-3.75,12.75) 163(-4.25,12.75) 164(-4.75,12.75) 165(-5.25,12.75) 166(-5.75,12.75) 167(-6.25,12.75) 168(-6.75,12.75) 169(-7.25,12.75) 170(-7.75,12.75) 171(-8.25,12.75) 172(-8.75,12.75) 173(-9.25,12.75) 174(-9.75,12.75) 175(-10.25,12.75) 176(-10.75,12.75)
MINI_USB
  rect 0.5x2.5 smd: 1(-1.6,2.6) 2(-0.8,2.6) 3(0,2.6) 4(0.8,2.6) 5(1.6,2.6)
  rect 2x2.5 smd: 6(4.4,2.6) 7(-4.4,2.6) 8(-4.4,-2.9) 9(4.4,-2.9)
  round 1.2 hole 1: 10(2.2,0) 11(-2.2,0)
OSC14REC12
  rect 1.4x1.2 smd: 1(-1.1,-0.95) 2(1.1,-0.95) 3(1.1,0.95) 4(-1.1,0.95)
OSC112896
  rect 1.8x2 smd: 1(0,0) 2(5.08,0) 3(5.08,4.2) 4(0,4.2)
PUSHBUTTON_4_09
  round 1.5 hole 0.9: 1(-3,2.5) 2(-3,-2.5) 3(3,-2.5) 4(3,2.5)
QFN_40_6X6
  oval 0.8x0.23 smd: 1(-3,2.25) 2(-3,1.75) 3(-3,1.25) 4(-3,0.75) 5(-3,0.25) 6(-3,-0.25) 7(-3,-0.75) 8(-3,-1.25) 9(-3,-1.75) 10(-3,-2.25) 21(3,-2.25) 22(3,-1.75) 23(3,-1.25) 24(3,-0.75) 25(3,-0.25) 26(3,0.25) 27(3,0.75) 28(3,1.25) 29(3,1.75) 30(3,2.25)
  oval 0.23x0.8 smd: 11(-2.25,-3) 12(-1.75,-3) 13(-1.25,-3) 14(-0.75,-3) 15(-0.25,-3) 16(0.25,-3) 17(0.75,-3) 18(1.25,-3) 19(1.75,-3) 20(2.25,-3) 31(2.25,3) 32(1.75,3) 33(1.25,3) 34(0.75,3) 35(0.25,3) 36(-0.25,3) 37(-0.75,3) 38(-1.25,3) 39(-1.75,3) 40(-2.25,3)
  rect 4.3x4.3 smd: 41(0,0)
RES_SMD_0402
  rect 0.889x0.711 smd: 1(-0.65,0) 2(0.65,0)
RES_SMD_0603
  rect 0.8x0.9 smd: 1(-0.8,0) 2(0.8,0)
SOT23
  rect 0.508x0.432 smd: 1(-0.889,0.94) 2(-0.889,-0.965) 3(0.889,0)
SOT23_6L
  rect 0.6x1.2 smd: 1(-0.95,-1.15) 2(0,-1.15) 3(0.95,-1.15) 4(0.95,1.15) 5(0,1.15) 6(-0.95,1.15)
SOT235L
  rect 0.6x1.2 smd: 1(-0.9,1.15) 2(0.05,1.15) 3(1,1.15) 4(-0.9,-1.15) 5(1,-1.15)
SOT_223
  rect 0.95x2.15 smd: 1(-2.3,-3) 2(0,-3) 3(2.3,-3)
  rect 3.25x2.15 smd: 4(0,3.1)
STA321
  rect 0.22x1 smd: 1(0,-0.5) 2(0.5,-0.5) 3(1,-0.5) 4(1.5,-0.5) 5(2,-0.5) 6(2.5,-0.5) 7(3,-0.5) 8(3.5,-0.5) 9(4,-0.5) 10(4.5,-0.5) 11(5,-0.5) 12(5.5,-0.5) 13(6,-0.5) 14(6.5,-0.5) 15(7,-0.5) 16(7.5,-0.5) 33(7.5,10.5) 34(7,10.5) 35(6.5,10.5) 36(6,10.5) 37(5.5,10.5) 38(5,10.5) 39(4.5,10.5) 40(4,10.5) 41(3.5,10.5) 42(3,10.5) 43(2.5,10.5) 44(2,10.5) 45(1.5,10.5) 46(1,10.5) 47(0.5,10.5) 48(0,10.5)
  rect 1x0.22 smd: 17(9.25,1.25) 18(9.25,1.75) 19(9.25,2.25) 20(9.25,2.75) 21(9.25,3.25) 22(9.25,3.75) 23(9.25,4.25) 24(9.25,4.75) 25(9.25,5.25) 26(9.25,5.75) 27(9.25,6.25) 28(9.25,6.75) 29(9.25,7.25) 30(9.25,7.75) 31(9.25,8.25) 32(9.25,8.75) 49(-1.75,8.75) 50(-1.75,8.25) 51(-1.75,7.75) 52(-1.75,7.25) 53(-1.75,6.75) 54(-1.75,6.25) 55(-1.75,5.75) 56(-1.75,5.25) 57(-1.75,4.75) 58(-1.75,4.25) 59(-1.75,3.75) 60(-1.75,3.25) 61(-1.75,2.75) 62(-1.75,2.25) 63(-1.75,1.75) 64(-1.75,1.25)
TEST_PAD1
  round 1 smd: 1(0,0)
TSOPII_86_22X12
  rect 0.8x0.3 smd: 1(-6,10.5) 2(-6,10) 3(-6,9.5) 4(-6,9) 5(-6,8.5) 6(-6,8) 7(-6,7.5) 8(-6,7) 9(-6,6.5) 10(-6,6) 11(-6,5.5) 12(-6,5) 13(-6,4.5) 14(-6,4) 15(-6,3.5) 16(-6,3) 17(-6,2.5) 18(-6,2) 19(-6,1.5) 20(-6,1) 21(-6,0.5) 22(-6,0) 23(-6,-0.5) 24(-6,-1) 25(-6,-1.5) 26(-6,-2) 27(-6,-2.5) 28(-6,-3) 29(-6,-3.5) 30(-6,-4) 31(-6,-4.5) 32(-6,-5) 33(-6,-5.5) 34(-6,-6) 35(-6,-6.5) 36(-6,-7) 37(-6,-7.5) 38(-6,-8) 39(-6,-8.5) 40(-6,-9) 41(-6,-9.5) 42(-6,-10) 43(-6,-10.5) 44(6,-10.5) 45(6,-10) 46(6,-9.5) 47(6,-9) 48(6,-8.5) 49(6,-8) 50(6,-7.5) 51(6,-7) 52(6,-6.5) 53(6,-6) 54(6,-5.5) 55(6,-5) 56(6,-4.5) 57(6,-4) 58(6,-3.5) 59(6,-3) 60(6,-2.5) 61(6,-2) 62(6,-1.5) 63(6,-1) 64(6,-0.5) 65(6,0) 66(6,0.5) 67(6,1) 68(6,1.5) 69(6,2) 70(6,2.5) 71(6,3) 72(6,3.5) 73(6,4) 74(6,4.5) 75(6,5) 76(6,5.5) 77(6,6) 78(6,6.5) 79(6,7) 80(6,7.5) 81(6,8) 82(6,8.5) 83(6,9) 84(6,9.5) 85(6,10) 86(6,10.5)
unnamed
  round 5 hole 4.5: (3.5,76.5) (3.5,3.5) (96.5,76.5) (96.5,3.5)
XTAL_32MHZ
  rect 1x1.8 smd: 1(-1.25,0) 2(1.25,0)

## Nets
2.5V: C8.1 C11.1 C62.1 C63.1 C64.1 C65.1 C66.1 TP1.1 U1.5(VOUT) U9.13 U9.16 U9.34
3.3V: C13.1 C16.1 C26.2 C100.1 C101.2 D10.2 J3.4 J5.1 JP1.2 R14.1 R20.1 R21.1 R22.1 R24.2 R31.1 R36.1 R53.2 R59.2 R66.2 R101.2 R110.2 R111.1 R119.1 TP2.1 U2.4(VO) X2.4(VDD) X3.4(VDD)
3.3V DDR: C69.2 C70.2 C71.2 C76.2 C77.2 C78.2 C79.2 C80.2 C81.2 C82.2 C83.2 C84.2 R110.1 U10.1 U10.3 U10.9 U10.15 U10.29 U10.35 U10.41 U10.43 U10.49 U10.55 U10.75 U10.81
3.3V_STA: C85.1 C86.2 C87.2 C88.2 C90.2 C91.2 C92.2 C93.1 C102.2 J6.1 JP1.1 R96.1 U12.3 U12.12 U12.24 U12.28 U12.35 U12.44 U12.52 U12.59 U14.1 U14.4 U14.10 U14.13 U14.14 X4.4
3V: C56.2 C57.2 C68.1 D10.1(K) U9.5 U9.8 U9.33
5V: C7.1 C9.1 C12.1 C15.1 D4.1(K) D7.1(K) J1.1 JP3.2 R32.2 TP3.1 U1.1 U1.3 U2.1 U2.6 U11.5
5V_EXT: C22.1 C23.1 D7.2 R29.2 U7.2(VOUT) U7.4
12V: C18.1 L1.1 U6.1
GND: C2.2 C3.1 C5.2 C7.2 C8.2 C9.2 C10.2 C11.2 C12.2 C13.2 C14.2 C15.2 C16.2 C17.1 C18.2 C19.2 C20.2 C21.2 C22.2 C23.2 C24.1 C25.1 C26.1 C27.2 C28.2 C29.2 C30.2 C31.2 C32.2 C33.2 C34.2 C35.2 C36.2 C37.2 C38.2 C39.2 C40.2 C41.2 C42.2 C43.2 C44.2 C45.2 C46.2 C47.1 C48.2 C49.2 C50.2 C51.1 C52.2 C53.2 C56.1 C57.1 C58.2 C61.1 C62.2 C63.2 C64.2 C65.2 C66.2 C68.2 C69.1 C70.1 C71.1 C72.2 C73.2 C74.2 C75.2 C76.1 C77.1 C78.1 C79.1 C80.1 C81.1 C82.1 C83.1 C84.1 C85.2 C86.1 C87.1 C88.1 C89.2 C90.1 C91.1 C92.1 C93.2 C100.2 C101.1 C102.1 C103.1 C104.1 D2.1(CATHODE) D3.1(CATHODE) D6.1(CATHODE) D8.1(CATHODE) D9.1(CATHODE) J1.10 J2.6 J3.1 J5.6 J6.4 J6.6 J6.8 J6.10 J6.12 J6.14 J6.16 Q1.1(E) R9.2 R19.2 R33.1 R52.2 R55.2 R57.2 R68.1 R69.1 R70.1 R71.1 R72.1 R73.1 R74.1 R75.1 R76.1 R77.1 R78.1 R79.1 R80.1 R81.1 R82.1 R83.1 R84.1 R85.1 R86.1 R87.1 R90.2 R91.2 R92.2 R93.2 R99.1 R102.2 R114.1 SW3.2 SW3.3 U1.2 U2.2 U2.7 U4.5 U4.6 U4.7 U4.8 U4.9 U4.10 U4.11 U5.2 U6.2 U7.1 U8.14 U8.22 U8.37(VSSA) U8.61 U8.71 U8.90 U8.102 U8.113 U8.126 U8.135 U8.148 U8.158 U9.3 U9.17 U9.31 U9.35 U9.41 U10.6 U10.12 U10.32 U10.38 U10.44 U10.46 U10.52 U10.58 U10.72 U10.78 U10.84 U10.86 U11.2 U12.2 U12.4 U12.13 U12.17 U12.23 U12.27 U12.36 U12.45 U12.53 U12.60 U14.7 X2.2 X3.2 X4.2
VCC: J2.1 JP3.1
VDD: C27.1 C28.1 C29.1 C30.1 C31.1 C32.1 C33.1 C34.1 C35.1 C36.1 C37.1 C38.1 C39.1 C40.1 C41.1 C42.1 C43.1 C44.1 C45.1 C48.1 C49.1 L2.1 R3.2 R11.2 R66.1 R97.2 R98.2 R116.2 R117.2 SW1.1 SW1.4 SW2.1 SW2.4 U8.6 U8.15 U8.23 U8.36 U8.49 U8.62 U8.72 U8.82 U8.91 U8.103 U8.114 U8.127 U8.136 U8.149 U8.159 U8.172
VDDA: C50.1 C51.2 L2.2 R67.2 U8.39
BICKO: R119.2 U8.1 U8.51 U8.93 U12.55
CKOUT: R107.1 U12.25 U14.3
CKOUT_4: R105.2 R106.1 U14.8 U14.12
FMC_A0: U8.16 U10.25
FMC_A1: U8.17 U10.26
FMC_A2: U8.18 U10.27
FMC_A3: U8.19 U10.60
FMC_A4: U8.20 U10.61
FMC_A5: U8.21 U10.62
FMC_A6: U8.60 U10.63
FMC_A7: U8.63 U10.64
FMC_A8: U8.64 U10.65
FMC_A9: U8.65 U10.66
FMC_A10: U8.66 U10.24
FMC_A11: U8.67 U10.21
FMC_BA0: U8.108 U10.22
FMC_BA1: U8.109 U10.23
FMC_D0: U8.104 U10.2
FMC_D1: U8.105 U10.4
FMC_D2: U8.142 U10.5
FMC_D3: U8.143 U10.7
FMC_D4: U8.68 U10.8
FMC_D5: U8.69 U10.10
FMC_D6: U8.70 U10.11
FMC_D7: U8.73 U10.13
FMC_D8: U8.74 U10.74
FMC_D9: U8.75 U10.76
FMC_D10: U8.76 U10.77
FMC_D11: U8.77 U10.79
FMC_D12: U8.78 U10.80
FMC_D13: U8.96 U10.82
FMC_D14: U8.97 U10.83
FMC_D15: U8.98 U10.85
FMC_NBL0: U8.169 U10.16
FMC_NBL1: U8.170 U10.71
FMC_SDCKE0: U8.35 U10.67
FMC_SDCLK: U8.112 U10.68
FMC_SDNCAS: U8.160 U10.18
FMC_SDNE0: U8.44 U10.20
FMC_SDNRAS: U8.59 U10.19
FMC_SDNWE: U8.46 U10.17(WE#)
I2C2_SCL: R12.1 R116.1 U8.79
I2C2_SDA: R13.2 R117.1 U8.80
I2S2_CKIN: R115.1 X3.3
LED_USER1: R64.2 U8.12
LED_USER2: R65.2 U8.13
LRCKO: U8.3 U8.50 U8.92 U12.56
MCLK: R95.2 R104.2 U8.54
MIC_CK: J6.3 R106.2 R107.2
MIC_DATA1: J6.5 U12.11
MIC_DATA2: J6.7 U12.10
MIC_DATA3: J6.9 U12.9
MIC_DATA4: J6.11 U12.8
MIC_DATA5: J6.13 U12.7
MIC_DATA6: J6.15 U12.6
NRST: R5.2 R16.1 U8.31
OSC25M: R49.1 X2.3
OSC32_IN: R34.2 U8.9
OSC32_OUT: R35.2 U8.10
OSC_CLK: R100.2 R103.2
OTG_FS_OVERCURRENT: R23.2 U8.176
OTG_FS_POWERSWITCHON: R25.1 U8.175
PA0: J1.2 R37.1
PA1: J1.3 R40.1
PA2: J1.4 R41.1
PA3: J1.5 R43.1
PA15: R89.2 U8.138 U9.40
PB2: U8.58 U9.39
PB3: JP2.1 U9.38
PB6: R97.1 U8.164 U9.2
PB7: R98.1 U8.165 U9.1
PC7: R95.1 U8.116 U9.37
PC10: R8.1 U8.139
PC11: R10.1 U8.140
PC12: U8.141
PD4: R87.2 U8.146 U9.32
PDM_CLK: R105.1 U12.1
PF6: J1.8 U8.24
PF8: J1.6 R61.2
PF10: J1.7 R63.2
PH2: J1.9 U8.43
PI8: R18.1 U8.7
PI9: R7.1 U8.11
PWDN: C89.1 R96.2 U8.2 U12.64
SDO_12: U8.53 U12.57
SDO_34: U8.33 U12.58
SDO_56: U8.5 U12.62
SPI5_CK: J5.5 R54.2 TP5.1
SPI5_MOSI: J5.3 R56.2 TP4.1
SPI6_CK: J5.2 R44.2
SPI6_MOSI: J5.4 R46.2
STA_RESET: R118.2 U12.15
SWCLK: R2.2 U8.137
SWDIO: R1.2 U8.124
SWO: JP2.3 R4.2
U5V_USB: C14.1 C17.2 D4.2 R30.1 U4.1(VCC) U5.5(VBUS) U11.1(OUT)
UART4_RX: J3.2 R10.2
UART4_TX: J3.3 R8.2
USB_FS1_N: R26.1 U4.2
USB_FS1_P: R27.1 U4.3
USB_OTG_FS_DM: U5.3 U8.122
USB_OTG_FS_DP: U5.1 U8.123
USB_OTG_FS_ID: R28.2 U8.121
VREF: C52.1 C53.1 R67.1 U8.38
XTI: R103.1 R104.1 U12.20(XTI)
N115879: C24.2 R34.1 X1.2
N115893: C25.2 R35.1 X1.1
N117103: R36.2 X2.1
N162834: R52.1 R53.1 U8.166
N163230: R57.1 R59.1 U8.171
N206390: JP2.2 JP2.4 U8.161
N226705: C10.1 U1.4
N233294: D2.2 R24.1
N238541: D5.1(CATHODE) Q1.3
N238552: Q1.2 R30.2 R33.2
N238566: D5.2 R31.2
N241763: R26.2 U5.4
N241767: R27.2 U5.6
N242760: R28.1 U4.4
N248007: C55.2 CN1.2 U9.15
N248035: C54.2 CN1.3 U9.14
N248189: CN1.1 R84.2
N248225: R88.1 U9.29 U9.30
N248229: C60.1 R88.2
N248233: C60.2 R89.1 R92.1
N248303: C58.1 U9.10
N248307: C59.1 U9.11
N248311: C59.2 U9.12
N248571: C54.1 R75.2
N248575: C55.1 R76.2
N248601: R94.1 U9.21 U9.22
N248611: C67.1 R94.2
N248615: C61.2 C67.2 R93.1
N248679: C75.1 U9.19(VQ)
N248687: C74.1 U9.28
N248695: C73.1 U9.27
N248703: C72.1 U9.18
N260798: C46.1 U8.125
N260805: C47.2 U8.81
N264179: D1.1(CATHODE) R21.2 R23.1 U11.3
N264257: D1.2 R20.2
N265526: R22.2 R25.2 U11.4
N266142: D6.2 R32.1
N294693: R55.1 U8.48
N298204: R49.2 U8.29
N307670: R54.1 U8.25
N313164: R40.2 U8.41
N313168: R41.2 U8.42
N313176: R43.2 U8.47
N314492: R61.1 U8.26
N314496: R56.1 U8.27
N314500: R63.1 U8.28
N343193: R37.2 U8.40
N345423: C1.2 R7.2 R9.1 SW1.2 SW1.3
N345707: C1.1 R3.1
N346106: C4.2 R18.2 R19.1 SW2.2 SW2.3
N346154: C4.1 R11.1
N347566: D8.2 R64.1
N347570: D9.2 R65.1
N380637: C19.1 C20.1 C21.1 L1.2 U7.3
N384702: D3.2 R29.1
N392150: C5.1 R14.2 R16.2 SW3.1 SW3.4
N398183: C2.1 R12.2 U12.19
N398229: C3.2 R13.1 U12.18
N401733: R44.1 U8.156
N401749: R46.1 U8.157
N404005: R90.1 U10.59
N404009: R91.1 U10.28
N414682: R85.2 U10.33
N414689: R83.2 U10.34
N414717: R82.2 U10.36
N414729: R81.2 U10.37
N414741: R80.2 U10.39
N414753: R79.2 U10.40
N414765: R78.2 U10.42
N414777: R77.2 U10.45
N414789: R74.2 U10.47
N414891: R86.2 U10.31
N414986: R73.2 U10.48
N414998: R72.2 U10.50
N415010: R71.2 U10.51
N415031: R70.2 U10.53
N415042: R69.2 U10.54
N415068: R68.2 U10.56
N500901: J2.2 R1.1
N500913: J2.3 R2.1
N500925: J2.4 R4.1
N500937: J2.5 R5.1
N801153: R99.2 R101.1 R102.1 X4.1
N801177: R100.1 X4.3
N846467: R111.2 X3.1
N856976: TP6.1 U12.51
N860674: C103.2 R112.2 U12.21
N860799: C104.2 R112.1
N867055: R114.2 U12.16
N892239: R115.2 U8.118
N898566: TP7.1 U14.2 U14.6(Q\1\) U14.11
N941023: R118.1 U8.32

Pads without a net: CN1 4; J6 2; U2 3 5; U6 3; U8 4 8 30 34 45 52 55 56 57 83 84 85 86 87 88 89 94 95 99 100 101 106 107 110 111 115 117 119 120 128 129 130 131 132 133 134 144 145 147 150 151 152 153 154 155 162 163 167 168 173 174; U9 4 6 7 9 20 23 24 25 26 36; U10 14 30 57 69 70 73; U12 5 14 22 26 29 30 31 32 33 34 37 38 39 40 41 42 43 46 47 48 49 50 54 61 63; U14 5 9

## Via types
v1: diameter 0.61, hole 0.33, TOP to BOTTOM, 423 vias

## Routing (per net, layer and track width the routed paths; a pad name or vN(x,y) marks a point on that pad's centre or on a via; arc(x,y) is an arc through that point)
2.5V: length 34.9
  TOP w0.2: C63.1 74.08,67.78 73.12,67.78 v1(73.08,67.83) ; 74,43.12 C8.1 ; 74,43.12 v1(74.88,43.12) ; 74,43.12 73.47,43.12 73.38,43.12 TP1.1 ; U9.34 62,67.87 61.98,67.88 v1(61.23,67.88) ; C62.1 58.98,67.28 v1(59.77,67.28) ; U9.16 68,67.37 68.08,67.38 68.47,67.38 68.67,67.58 68.83,67.58 v1(69.08,67.83) ; U9.13 68,65.87 68.08,65.88 70.22,65.88 70.83,65.28 v1(70.97,65.28) 71.83,65.28 C65.1
  INT_LAYER3 w0.3: 72.97,58.27 72.58,58.27 69.28,54.98 69.28,46.88 ; 71.08,43.92 71.08,47.48 71.47,47.88 71.97,47.88 72.42,47.42 72.42,46.48
  BOTTOM w0.2: C11.1 72.38,43.03 72.42,43.12 v1(72.42,44.02) ; C66.1 73.73,62 73.78,62.08 73.78,62.88 73.67,62.98 v1(73.22,62.98) ; v1(74.03,44.12) 74.03,43.27 74,43.18 C8.1 ; C64.1 v1(73.67,58.27) ; v1(76.38,44.58) 76.38,43.98 76.35,43.88 U1.5
3.3V: length 283.1
  TOP w0.3: v1(53.9,7.12) v1(54.92,7.12) ; v1(17.52,70.33) 17.38,70.17 13.22,70.17 10.93,67.88 10.88,67.77 R14.1 ; D10.2 76.47,61.02 77.17,61.02 77.22,60.98 77.22,60.92 ; J5.1 33.34,73.98 33.38,74.03 34.58,75.22 34.58,76.97 35.33,77.72 36.42,77.72 37.12,77.03 37.12,76.08 37.98,75.22 40.92,75.22 41.73,74.42 50.33,74.42 52.42,76.53 53.18,76.5 J3.4 ; v1(11.47,9.72) 10.18,9.72 10.12,9.72 C100.1 ; R119.1 28.62,66.4 28.68,66.42 29.52,66.42 29.57,66.38 v1(29.57,66.03) ; v1(60.12,47.62) 60.12,40.48 56.42,36.77 56.42,7.47 55.23,6.28 v1(54.67,6.28) ; v1(44.77,60.33) 48.48,56.62 v1(53.23,56.62) ; 77.22,60.92 77.58,60.92 77.67,61.02 80.62,61.02 ; 77.22,60.92 v1(77.22,60.67) ; 80.62,61.02 82.33,61.02 ; 80.62,61.02 v1(80.62,61.92) ; 82.33,61.02 82.33,61.62 82.72,62.02 95.78,62.02 96.42,61.38 96.42,61 R20.1 ; 82.33,61.02 83.33,61.02 R21.1 ; R36.1 17.47,44 17.48,44.08 17.48,47.58 17.62,47.73 18.93,47.73 v1(18.9,47.7) ; v1(26.18,28.57) 26.18,27.32 R101.2 ; v1(70.12,50.83) v1(67.97,50.83)
  INT_LAYER3 w0.3: v1(27.12,64.72) 27.02,64.72 26.93,64.83 26.93,65.62 ; v1(53.23,56.62) 53.48,56.88 58.12,56.88 58.27,56.73 ; 32.06,72.7 J5.1 ; J5.1 33.34,72.7 ; J5.1 34.61,75.26 ; J5.1 32.06,73.98 ; 12.38,41.17 13.53,40.02 13.53,17.43 13.28,17.18 13.28,11.53 v1(11.47,9.72) ; v1(77.22,60.67) 77.22,60.08 73.97,56.83 71.83,56.83 ; v1(25.98,53.27) 25.98,50.98 23.73,48.73 21.57,48.73 21.48,48.83 ; 68.17,28.18 54.92,14.93 v1(54.92,7.12) ; v1(26.18,28.57) 24.12,30.62 24.12,36.08 21.82,38.38 21.82,41.17 ; 23.12,52.38 23.12,50.92 22.32,50.12 21.48,50.12 20.82,50.77 20.82,51.58 ; 38.73,65.53 39.58,65.53 v1(44.77,60.33) ; 22.68,40.67 22.68,41.17 22.07,41.77 21.57,41.77 21.18,41.38 21.18,40.62 ; v1(17.52,70.33) 18.32,70.33 20.02,68.62 26.68,68.62 27.88,67.42
  BOTTOM w0.3: R53.2 35,69.03 35.02,69.12 35.02,70.03 ; v1(34.98,70.78) 35.02,70.72 35.02,70.03 ; v1(25.98,53.27) 25.98,63.58 v1(27.12,64.72) ; v1(68.97,37.48) 68.97,47.17 v1(68.53,47.62) ; v1(66.65,52.12) 66.67,52.12 v1(67.97,50.83) ; U2.4 77.3,32.8 v1(77.33,32.92) ; R59.2 33.38,69.03 33.42,69.12 33.42,69.97 33.48,70.03 35.02,70.03 ; v1(80.62,61.92) 80.62,60.98 80.62,60.9 R22.1 ; v1(54.67,6.28) 54.62,6.28 53.92,6.97 53.92,7.08 v1(53.9,7.12)
  vias: v1(15.4,47.25) v1(61.42,52.15) v1(61.53,50.25) v1(70.28,32.62) v1(71.88,33.75) v1(72.4,30.38) v1(74,31.15) v1(75.62,31.3)
3.3V DDR: length 49.3
  TOP w0.2: U10.81 48.98,26.73 49.42,26.73 49.48,26.68 49.52,26.68 49.62,26.57 ; 36.38,22.27 36.88,22.27 U10.15 ; 49.42,10.78 48.98,10.78 U10.49 ; U10.29 36.98,15.28 37.42,15.28 ; 36.38,28.27 36.88,28.27 U10.3 ; 36.38,25.27 36.88,25.27 U10.9 ; 49.42,23.77 48.98,23.77 U10.75
  TOP w0.215: 36.33,25.27 36.38,25.27 ; 36.33,22.27 36.38,22.27 ; 36.33,28.27 36.38,28.27 ; 49.48,23.77 49.42,23.77 ; 37.48,15.28 37.42,15.28 ; 49.48,10.78 49.42,10.78
  TOP w0.218: 49.67,26.57 49.62,26.57
  TOP w0.23: 36.27,22.27 36.33,22.27 ; 37.52,15.28 37.48,15.28 ; 36.27,28.27 36.33,28.27 ; 36.27,25.27 36.33,25.27 ; 49.52,23.77 49.48,23.77 ; 49.52,10.78 49.48,10.78
  TOP w0.233: 49.73,26.57 49.67,26.57
  TOP w0.245: 36.23,25.27 36.27,25.27 ; 49.58,23.77 49.52,23.77 ; 49.58,10.78 49.52,10.78 ; 36.23,28.27 36.27,28.27 ; 37.58,15.28 37.52,15.28 ; 36.23,22.27 36.27,22.27
  TOP w0.251: 49.77,26.52 49.73,26.57
  TOP w0.26: 49.62,23.77 49.58,23.77 ; 36.17,25.27 36.23,25.27 ; 37.62,15.28 37.58,15.28 ; 36.17,28.27 36.23,28.27 ; 36.17,22.27 36.23,22.27 ; 49.62,10.78 49.58,10.78
  TOP w0.269: 49.83,26.52 49.77,26.52
  TOP w0.275: 36.12,25.27 36.17,25.27 ; 36.12,22.27 36.17,22.27 ; 36.12,28.27 36.17,28.27 ; v1(37.67,15.28) 37.62,15.28 ; 49.67,23.77 49.62,23.77
  TOP w0.278: v1(49.67,10.72) 49.62,10.78
  TOP w0.284: 49.88,26.52 49.83,26.52
  TOP w0.29: 49.73,23.77 49.67,23.77 ; 36.08,22.27 36.12,22.27 ; 36.08,28.27 36.12,28.27 ; 36.08,25.27 36.12,25.27
  TOP w0.299: 49.92,26.52 49.88,26.52
  TOP w0.3: 34.02,30.12 34.02,30.77 v1(33.12,31.68) ; 34.02,30.12 34.98,30.12 C80.2 ; 34.02,30.12 34.02,28.23 34.08,28.18 34.27,28.18 ; 34.27,28.18 34.98,28.18 C69.2 35.12,28.27 35.92,28.27 ; 34.27,28.18 34.27,27.77 34.02,27.52 34.02,24.98 34.08,24.93 34.27,24.93 ; 34.27,24.93 34.98,24.93 C82.2 35.38,25.27 36.08,25.27 ; 34.27,24.93 34.27,24.52 34.02,24.27 34.02,22.93 34.67,22.27 36.08,22.27 ; 35.92,28.27 36.08,28.27 ; 35.92,28.27 35.92,29.23 35.98,29.27 36.88,29.27 U10.1 ; 49.73,23.77 50.62,23.77 C84.2 50.83,23.62 51.67,23.62 53.17,25.12 v1(53.17,25.98) 52.27,26.88 50.83,26.88 C81.2 50.42,26.52 49.92,26.52 ; v1(35.12,18.57) 32.92,20.77 32.92,21.93 C83.2
  INT_LAYER3 w0.15: 38.52,19.82 38.52,19.23 38.73,19.02
  INT_LAYER3 w0.2: 38.52,19.82 38.52,19.88 ; 38.77,18.98 38.73,19.02
  INT_LAYER3 w0.3: 38.52,19.88 38.52,20.12 ; 39.02,18.73 38.77,18.98
  BOTTOM w0.3: C77.2 37.92,14.57 v1(37.92,15.47) ; 36.85,8.25 U10.43 ; 36.85,8.25 C70.2 36.88,7.22 36.88,6.33 36.92,6.28 38.83,6.28 39.17,6.62 39.17,7.28 v1(39.38,7.47) ; 36.85,8.25 C71.2 ; C78.2 49.02,9.97 49.02,10.38 49.52,10.88 49.67,10.88 v1(49.73,10.82) ; v1(38.83,12.18) 38.17,11.53 C76.2
  vias: v1(52.6,7.12)
3.3V_STA: length 95.6
  TOP w0.2: 14.38,15.07 14.37,15.12 U12.12
  TOP w0.23: 14.38,14.97 U12.12
  TOP w0.245: 14.38,14.93 14.38,14.97
  TOP w0.26: 14.38,14.88 14.38,14.93
  TOP w0.275: 14.38,14.82 14.38,14.88
  TOP w0.29: 14.38,14.78 14.38,14.82
  TOP w0.3: X4.4 28.7,21.5 28.73,21.48 28.73,19.73 v1(28.48,19.48) ; U12.44 10.87,26.12 10.88,26.18 10.88,27.12 11.28,27.52 11.93,27.52 12.28,27.88 12.28,28.07 ; 12.28,28.52 12.28,28.07 ; 12.28,28.52 11.32,28.52 11.27,28.5 C90.2 ; 12.28,28.52 v1(12.32,28.52) ; 12.28,28.07 12.68,28.07 13.57,27.18 15.32,27.18 15.38,27.12 15.38,26.18 15.37,26.12 U12.35 ; v1(14.85,12.75) 14.88,12.78 14.88,13.62 14.38,14.12 14.38,14.78 ; 9.38,16.68 9.88,16.18 9.88,15.18 9.87,15.12 U12.3 ; 9.38,16.68 v1(9.38,16.88) ; 9.38,16.68 v1(9.32,16.73) ; C92.2 4.38,19.53 4.47,19.57 5.72,19.57 v1(6.03,19.27) 6.12,19.38 7.08,19.38 7.12,19.37 U12.59 ; v1(10.68,18.07) 10.93,18.07 11.38,18.52 15.28,18.52 15.68,18.93 v1(15.66,18.88) ; 19.23,20.68 19.23,22.32 19.18,22.38 v1(19.02,22.38) 18.18,22.38 18.12,22.37 U12.28 ; 19.23,20.68 20.02,20.68 20.48,20.23 C87.2 ; 19.23,20.68 19.23,20.48 19.12,20.38 18.18,20.38 18.12,20.37 U12.24 ; U12.52 7.12,22.87 6.22,22.88 5.33,23.77 4.42,23.77 v1(4.38,23.78) ; J6.1 v1(57.23,20.27)
  INT_LAYER3 w0.15: 36.83,19.43 39.62,19.43
  INT_LAYER3 w0.2: JP1.1 8.08,11.95 ; JP1.1 6.88,11.95 ; JP1.1 5.67,11.95
  INT_LAYER3 w0.3: 25.32,19.57 25.62,19.57 26.52,20.48 35.77,20.48 36.83,19.43 ; 25.32,19.57 25.43,19.48 v1(28.48,19.48) ; 25.32,19.57 24.82,20.07 ; v1(57.23,20.27) 56.48,19.52 48.33,19.52 46.67,21.18 41.38,21.18 39.62,19.43 ; v1(10.68,18.07) 12.43,19.82 12.53,19.82
  BOTTOM w0.3: U14.13 10.59,21.42 10.68,21.43 11.82,21.43 11.97,21.57 v1(11.97,21.68) ; U14.1 15.67,22.69 15.93,22.73 16.23,23.02 16.23,23.43 16.27,23.48 16.62,23.48 v1(16.88,23.23) ; C102.2 8.15,22.62 8.18,22.68 8.18,23.52 8.22,23.57 10.53,23.57 v1(10.62,23.48) 10.62,22.77 10.59,22.69 U14.14 ; v1(9.38,16.88) 10.12,17.62 10.59,17.61 U14.10
  vias: v1(3.72,14.62) v1(9.1,12.75) v1(15.78,28.5) v1(20.5,23.28)
3V: length 19.5
  TOP w0.2: 65.92,62.77 65.83,62.77 ; 64.78,63.77 64.75,64.12 U9.5 ; 66.28,63.77 66.25,64.12 U9.8
  TOP w0.255: 64.78,63.73 64.78,63.77 ; 65.83,62.77 65.78,62.77 ; 66.28,63.73 66.28,63.77 ; 65.97,62.77 65.92,62.77
  TOP w0.3: 66.28,63.62 66.28,63.73 ; 64.78,63.62 64.78,63.73 ; 66.08,62.77 65.97,62.77 ; 65.78,62.77 65.67,62.77
  TOP w0.355: 64.78,63.58 64.78,63.62 ; 66.12,62.77 66.08,62.77 ; 65.67,62.77 65.62,62.77 ; 66.28,63.58 66.28,63.62
  TOP w0.4: 66.28,63.48 66.28,63.58 ; 64.78,63.48 64.78,63.58
  TOP w0.41: 66.17,62.77 66.12,62.77 ; 65.62,62.77 65.58,62.77
  TOP w0.455: 66.28,63.42 66.28,63.48 ; D10.1 73.97,61.02 73.92,61.02 ; 64.78,63.42 64.78,63.48
  TOP w0.465: 65.58,62.77 65.53,62.77 ; 66.22,62.77 66.17,62.77
  TOP w0.51: 64.78,63.38 64.78,63.42 ; D10.1 73.92,61.02 73.88,61.02 ; 66.28,63.38 66.28,63.42
  TOP w0.52: 65.53,62.77 65.47,62.77 ; 66.28,62.77 66.22,62.77
  TOP w0.565: 64.78,63.33 64.78,63.38 ; 73.83,61.02 73.88,61.02 ; 66.28,63.33 66.28,63.38
  TOP w0.575: 65.47,62.77 65.42,62.77 ; 66.33,62.77 66.28,62.77
  TOP w0.6: v1(71.53,61.02) 71.58,61.02
  TOP w0.62: 73.78,61.02 73.83,61.02
  TOP w0.63: 65.42,62.77 65.38,62.77 ; 66.38,62.77 66.33,62.77
  TOP w0.631: 66.33,63.27 66.28,63.33 ; 64.83,63.27 64.78,63.33
  TOP w0.655: 71.58,61.02 71.62,61.02
  TOP w0.675: 73.72,61.02 73.78,61.02
  TOP w0.685: 65.38,62.77 65.33,62.77 ; 66.42,62.77 66.38,62.77
  TOP w0.7: 66.33,63.27 66.42,63.17 v1(66.42,62.88) 66.42,61.83 66.38,61.77 C57.2 ; v1(60.58,68.78) 58.98,68.78 C68.1 ; 65.33,62.77 64.83,63.27 ; 71.62,61.02 73.72,61.02
  INT_LAYER3 w0.6: 67.97,61.23 68.08,61.23
  INT_LAYER3 w0.655: 67.92,61.23 67.97,61.23 ; 68.08,61.23 68.12,61.23
  INT_LAYER3 w0.7: 68.12,61.23 71.33,61.23 v1(71.53,61.02) ; v1(60.58,68.78) 60.62,68.83 61.62,68.83 62.23,68.22 62.23,63.83 ; 67.83,61.23 67.92,61.23
  vias: v1(64.25,60.9)
5V: length 133
  TOP w0.3: JP3.2 14.33,76.12 14.38,76.12 6.38,68.12 6.38,44.98 3.62,42.23 3.61,39.83 J1.1
  INT_LAYER3 w0.15: 82.53,52.88 82.53,53.67
  INT_LAYER3 w0.153: 82.53,52.83 82.53,52.88 ; 82.53,53.67 82.53,53.73
  INT_LAYER3 w0.231: 82.53,53.73 82.53,53.77 ; 82.53,52.77 82.53,52.83
  INT_LAYER3 w0.3: 81.83,46.98 82.53,47.67 82.53,52.77 ; 82.53,53.77 v1(82.53,60.23)
  BOTTOM w0.3: v1(79.22,30.07) 79.2,30.2 U2.1 ; JP3.2 14.33,76.12 14.43,76.17 16.02,77.78 61.62,77.78 64.67,74.72 64.67,74.28 72.92,66.03 77.58,66.03 81.58,62.02 81.58,60.73 82.08,60.23 v1(82.53,60.23) 82.58,60.23 82.78,60.42 82.78,61.23 82.73,61.25 U11.5 ; U2.6 79.2,32.8 v1(79.22,32.92)
  vias: v1(78.65,43.88) v1(78.65,41.98) v1(81.5,42.1) v1(82.5,31.9) v1(83.25,41.95) v1(84.12,32.05) v1(89.62,32.25) v1(89.75,41.75) v1(93.25,36.88) v1(93.97,42.38)
5V_EXT: length 8
  TOP w0.3: v1(94.12,25.82) 94.12,28.88 94.1,28.88 ; D7.2 89.62,29.85 89.67,29.88 92.12,29.88 93.08,28.93 94.12,28.93 94.1,28.88 ; 94.1,28.88 R29.2
  vias: v1(79.28,21.62) v1(80.1,24.5) v1(87.88,21.38) v1(93.97,21.38)
12V: length 18.8
  TOP w0.3: 76.07,4.62 C18.1 ; C18.1 77.88,4.62 ; C18.1 76.97,2.67 ; C18.1 76.97,6.58 ; 85.58,7.33 U6.1 ; U6.1 89.9,9.25 ; U6.1 85.1,9.25 ; U6.1 87.5,6.85 ; L1.1 78.35,7.75 ; L1.1 76.15,7.75 ; L1.1 77.25,6.8
GND: length 600.7
  TOP w0.15: U8.61 38.9,38.25 38.92,38.23 38.92,37.62 38.52,37.23 38.52,36.42 C38.2
  TOP w0.23: 62,67.37 62.02,67.38
  TOP w0.25: 49.33,28.18 49.02,28.18 48.98,28.23
  TOP w0.252: 49.38,28.18 49.33,28.18
  TOP w0.269: 49.42,28.18 49.38,28.18
  TOP w0.279: 61.67,67.28 61.98,67.33
  TOP w0.283: 61.62,67.28 61.67,67.28
  TOP w0.299: 61.58,67.28 61.62,67.28
  TOP w0.3: 23,43.27 24.5,43.27 C52.2 ; 23,43.27 C53.2 ; 23,43.27 22.98,43.27 22.07,43.27 22.02,43.23 22.02,38.62 ; U4.7 90.41,49.25 90.47,49.27 92.17,49.27 93.03,50.12 93.03,50.27 ; U9.35 62,67.37 61.98,67.33 U9.35 ; U9.35 64.78,67.38 ; C22.2 77.97,21.62 77.92,21.62 76.97,21.62 ; v1(66.12,49.38) 66.17,49.33 66.17,48.48 66.15,48.38 C28.2 C27.2 66.15,45.38 ; U12.17 18.12,16.87 18.18,16.88 19.62,16.88 v1(19.88,16.62) ; C61.1 71.72,74.78 72.62,74.78 73.17,74.22 73.17,73.03 73.08,72.92 72.67,72.92 ; 55.42,14.88 55.42,13.93 55.33,13.82 54.92,13.82 ; 55.42,14.88 51.83,14.88 51.42,15.28 48.98,15.28 U10.58 ; 55.42,14.88 55.42,15.22 54.88,15.78 54.73,15.78 ; 76.97,21.62 76.97,20.98 77.28,20.68 79.97,20.68 82.97,23.68 87.87,23.67 U7.1 ; 76.97,21.62 v1(76.88,21.62) 75.88,22.62 75.88,24.32 ; R77.1 R74.1 R73.1 R72.1 R81.1 R80.1 R79.1 R78.1 36.73,4.38 v1(35.62,4.38) ; 54.88,17.57 54.88,16.32 54.73,16.18 54.73,15.78 ; 54.88,17.57 54.88,17.73 50.17,22.43 49.62,22.43 49.48,22.27 48.98,22.27 U10.72 ; 54.88,17.57 55.27,17.57 55.38,17.68 55.38,24.77 51.98,28.18 51.73,28.18 ; C46.2 60.85,60.38 60.92,60.42 61.83,60.42 v1(61.88,60.38) ; U10.86 49.12,29.48 51.08,29.48 51.73,28.82 51.73,28.18 ; U4.11 93.01,51.45 93.03,51.48 93.03,50.27 ; 22.07,38.62 22.07,38.02 22.32,37.77 22.32,36.67 22.3,36.62 C50.2 ; 22.07,38.62 22.02,38.62 ; 22.07,38.62 23.07,38.62 23.1,38.62 C51.1 ; C101.1 60.23,50.25 60.23,50.27 59.23,50.27 ; C75.2 71.72,71.53 72.47,71.53 ; 66.15,45.38 C29.2 ; 66.15,45.38 66.17,45.42 67.17,45.42 67.97,44.62 67.97,43.62 ; C72.2 71.8,69.88 71.88,69.92 72.72,69.92 72.78,69.88 72.78,69.72 ; C48.2 66.83,43.38 66.88,43.42 67.92,43.42 67.97,43.48 67.97,43.62 ; v1(86.88,75.62) 87.92,75.62 87.97,75.62 R84.1 ; U10.46 48.98,9.28 49.83,9.28 50.12,8.97 v1(50.12,8.62) 50.12,8.57 49.83,8.28 48.98,8.28 U10.44 ; U12.2 9.37,15.12 9.38,15.18 9.38,15.78 9.03,16.12 8.93,16.12 8.62,16.43 v1(8.62,17.43) ; 8.97,28.52 9.93,28.52 9.97,28.5 C90.1 ; 8.97,28.52 7.33,28.52 6.17,29.68 6.15,29.67 6.14,29.67 ; 8.97,28.52 8.97,29.12 9.32,29.48 12.38,29.48 13.32,28.52 14.43,28.52 14.47,28.5 C86.1 ; 8.97,28.52 8.97,27.88 9.32,27.52 9.97,27.52 10.38,27.12 10.38,26.18 10.37,26.12 U12.45 10.38,25.12 10.43,25.07 14.82,25.07 14.88,25.12 14.88,26.07 14.87,26.12 U12.36 ; 74.17,64.42 74.17,65.22 74.12,65.28 73.22,65.28 C65.2 ; 74.17,64.42 v1(74.12,64.38) ; 74.17,64.42 74.22,64.38 74.22,63.48 v1(74.2,63.38) ; C83.1 32.88,23.27 C83.1 ; C83.1 31.98,23.27 31.12,22.43 v1(31.12,15.88) 31.23,15.78 32.33,15.78 R91.2 ; 28.12,4.97 28.07,5.03 27.27,5.03 27.18,5 C104.1 ; 28.12,4.97 28.12,6.47 27.98,6.62 v1(27.03,6.62) ; 28.12,4.97 v1(28.12,4.88) ; U8.113 54.4,52.25 54.48,52.27 55.12,52.27 55.48,51.92 55.48,51.83 55.92,51.38 v1(56.12,51.38) ; 72.47,71.53 72.62,71.53 73.28,70.88 73.28,70.72 ; 72.47,71.53 72.47,71.92 72.67,72.12 72.67,72.92 ; 59.23,50.27 v1(59.12,50.38) ; 59.23,50.27 59.23,49.62 59.42,49.42 59.42,47.38 58.42,46.38 56.58,46.38 C43.2 56.27,46.38 55.88,46.77 54.48,46.77 54.4,46.75 U8.102 ; 72.78,69.72 72.78,69.22 72.42,68.88 v1(71.88,68.88) ; 72.78,69.72 73.17,69.72 73.28,69.83 73.28,69.97 ; v1(64.62,54.38) 63.42,54.38 63.33,54.35 X3.2 ; 54.92,8.78 54.92,10.32 ; 54.92,8.78 55.52,8.78 v1(55.62,8.88) ; 54.92,8.78 53.98,8.78 R71.1 ; 54.92,10.32 55.33,10.32 55.42,10.43 55.42,11.72 54.88,12.28 54.73,12.28 ; 54.92,10.32 54.92,10.47 54.88,10.53 53.98,10.53 R70.1 ; C25.1 17.73,56.25 17.73,56.27 16.73,56.27 ; R86.1 32.33,14.03 31.23,14.03 v1(31.12,14.12) ; 15.88,12.78 v1(15.88,11.62) 16.12,11.38 17.88,11.38 17.88,11.35 R114.1 ; 15.88,12.78 15.88,13.72 15.82,13.78 15.47,13.78 14.88,14.38 14.88,15.07 14.87,15.12 U12.13 ; 15.88,12.78 C93.2 ; 54.73,15.78 53.98,15.78 R90.2 ; 93.03,57.08 93.03,55.88 93.01,55.86 ; 93.03,57.08 93.42,57.08 93.53,57.17 93.53,57.48 94.12,58.08 95.88,58.08 95.91,58.05 U4.9 ; 93.03,57.08 93.03,57.23 92.17,58.08 90.47,58.08 90.41,58.05 U4.6 ; 93.01,55.86 92.42,55.27 90.47,55.27 90.41,55.25 U4.5 ; 93.01,55.86 U4.10 ; v1(5.62,18.38) 5.53,18.27 4.47,18.27 4.38,18.23 ; 64.78,67.38 68,67.87 U9.17 ; 64.78,67.38 65,67.12 U9.41 ; 22.02,38.62 v1(21.12,38.62) ; R57.2 R52.2 35.08,69.42 36.08,69.42 v1(36.12,69.38) 39.92,65.58 39.92,63.83 39.9,63.75 U8.158 ; 63.75,74.53 63.77,74.62 63.77,75.47 63.62,75.62 58.02,75.62 57.17,74.78 57.17,74.47 57.27,74.38 57.67,74.38 ; 63.75,74.53 C74.2 ; 63.75,74.53 65.38,74.53 C73.2 ; v1(92.88,44.12) 93.78,44.12 93.82,44.12 D6.1 ; 49.42,28.18 49.52,28.18 49.62,28.07 50.67,28.07 C81.1 50.83,28.18 51.73,28.18 ; 73.28,70.72 74.92,70.72 75.83,71.62 76.7,71.62 R76.1 ; 73.28,70.72 73.28,69.97 ; 37.33,31.43 35.08,31.43 C80.1 ; 37.33,31.43 37.33,36.23 37.38,36.27 38.33,36.27 C38.2 ; 37.33,31.43 42.83,31.43 v1(42.88,31.38) ; 93.03,50.27 93.42,50.27 93.53,50.17 93.53,49.88 94.12,49.27 95.88,49.27 95.91,49.25 U4.8 ; 57.67,74.38 57.67,74.53 57.73,74.58 58.58,74.58 R92.2 ; 57.67,74.38 57.67,72.42 58.33,71.78 58.77,71.78 ; 27,43.73 26.98,43.77 26.02,43.77 v1(25.88,43.62) ; 27,43.73 28.9,43.75 U8.37 ; 27,43.73 C34.2 ; D8.1 19.48,54.77 18.68,54.77 18.18,55.27 17.07,55.27 16.73,55.62 16.73,56.27 ; U8.148 44.9,63.75 44.92,63.83 44.92,65.17 v1(45.12,65.38) ; C57.1 66.38,60.47 ; 66.38,60.47 68,60.32 C58.2 ; 66.38,60.47 66.38,60.48 65.47,60.48 v1(65.38,60.38) 65.38,59.83 65.17,59.62 64.33,59.62 C56.1 ; 81.33,53.27 C17.1 ; 81.33,53.27 81.72,53.67 v1(81.72,54.62) ; 81.33,53.27 80.67,53.27 80.6,53.25 U5.2 ; C23.2 76.88,24.52 75.92,24.52 75.88,24.48 75.88,24.32 ; v1(14.12,48.38) 14.12,47.33 C26.1 ; 58.77,71.78 58.77,71.08 58.73,71 R87.1 ; 58.77,71.78 58.77,71.92 58.83,71.97 60.67,71.97 61.88,70.78 v1(61.88,70.12) 62.02,69.97 62.02,69.42 62,69.37 U9.31 ; 21.52,20.02 21.52,21.88 21.43,21.98 20.57,21.98 20.5,21.97 C88.1 ; 21.52,20.02 21.52,19.07 ; 21.52,20.02 25.73,20.02 26.18,20.48 26.18,23.98 R99.1 R102.2 ; 67.97,43.62 68.38,43.62 68.47,43.52 68.47,41.58 67.92,41.02 66.88,41.02 C49.2 ; 16.73,56.27 16.48,56.27 v1(16.38,56.38) ; R55.2 31.38,34.73 31.38,34.77 30.73,34.77 23.93,27.98 19.68,27.98 16.27,24.57 8.32,24.57 7.83,25.07 6.33,25.07 v1(6.12,24.88) ; C42.2 57.38,40.47 57.48,40.48 58.77,40.48 v1(58.88,40.38) ; U8.90 54.4,40.75 54.38,40.77 53.27,40.77 53.23,40.73 53.23,39.88 53.42,39.67 v1(53.48,39.67) ; U9.3 63.75,64.12 63.77,64.08 63.77,63.33 63.88,63.23 v1(63.88,63.12) ; 21.52,19.07 21.93,19.07 22.02,18.98 22.02,17.38 22.98,16.43 24.48,16.43 24.5,16.42 X4.2 ; 21.52,19.07 21.52,18.93 21.48,18.88 20.52,18.88 C87.1 20.48,18.88 19.62,18.88 19.23,19.27 19.23,19.82 19.18,19.88 U12.23 18.12,19.87 18.07,19.88 v1(17.07,19.88) ; 74.17,14.53 74.92,14.53 74.97,14.5 C21.2 ; 74.17,14.53 74.17,14.97 73.97,15.18 73.97,15.97 74.03,16.02 74.92,16.02 74.97,16 C20.2 ; 74.17,14.53 74.03,14.53 72.88,13.38 v1(72.88,12.38) 72.92,12.43 73.88,12.43 73.9,12.38 C19.2 ; v1(47.38,12.12) 47.52,12.28 48.88,12.28 U10.52 ; v1(16.38,59.12) 16.48,59.02 17.73,59.02 17.73,59 C24.1 ; v1(3.38,22.38) 3.48,22.48 4.38,22.48 4.38,22.47 ; 4.38,18.23 4.42,18.27 3.42,18.27 2.73,17.57 2.73,16.32 2.77,16.27 3.73,16.27 3.73,16.25 C89.2 ; 4.38,18.23 C92.1 ; 72.67,72.92 72.67,73.08 72.62,73.12 71.72,73.12 71.65,73.12 R93.2 ; C100.2 10.12,6.52 10.18,6.53 11.43,6.53 12.18,7.28 12.18,12.03 11.43,12.78 10.43,12.78 C85.2 10.43,12.82 10.43,13.68 v1(10.62,13.88) 10.38,14.12 10.38,15.07 10.37,15.12 U12.4 ; U8.14 28.9,55.25 28.88,55.27 27.77,55.27 26.88,54.38 v1(26.88,52.12) ; R85.1 R83.1 32.33,10.53 31.38,10.53 31.12,10.28 v1(31.12,8.88) 31.23,8.78 32.33,8.78 R82.1 ; C68.2 C62.2 57.62,67.22 57.62,66.88 58.23,66.28 59.77,66.28 v1(60.62,67.12) 60.67,67.17 61.27,67.17 61.33,67.22 61.48,67.22 61.52,67.28 61.58,67.28 ; 54.92,13.82 54.92,12.88 54.73,12.68 54.73,12.28 ; 54.92,13.82 54.92,13.97 54.88,14.03 53.98,14.03 R68.1 ; 75.88,24.32 75.47,24.32 75.38,24.43 75.38,26.88 73.47,28.77 72.62,28.77 D2.1 ; D3.1 93.95,30.62 93.92,30.62 v1(92.88,30.62) ; X2.2 21.12,45.77 21.12,44.83 20.93,44.62 v1(20.62,44.62) ; 54.73,12.28 53.98,12.28 R69.1 ; U12.53 7.12,22.37 7.08,22.38 5.42,22.38 5.33,22.48 4.42,22.48 4.38,22.47 ; C91.1 4.38,22.47 ; C84.1 50.42,25.27 U10.78 ; 73.28,69.97 74.12,69.97 75.42,68.67 75.42,67.83 C63.2 ; C82.1 U10.12 ; C18.2 73.78,4.62 J6.14 ; 48.98,28.23 U10.84 48.98,28.23
  INT_LAYER2 w0.3: 93.01,50.4 U4.11 ; U4.11 93.01,52.51 ; U4.11 94.07,51.45 ; U4.11 91.96,51.45 ; J6.6 69.07,15.17 ; 45.56,75.22 J3.1 ; J3.1 45.56,77.78 ; J3.1 44.28,76.5 ; 2.52,66.5 SW3.3 ; SW3.3 4.73,66.5 ; SW3.3 3.62,67.6 ; SW3.3 3.62,65.4 ; 91.1,9.25 U6.2 ; U6.2 93.5,11.65 ; U6.2 93.5,6.85 ; U6.2 95.9,9.25 ; 2.52,72.5 SW3.2 ; SW3.2 4.73,72.5 ; SW3.2 3.62,71.4 ; 91.96,55.85 U4.10 ; U4.10 93.01,56.91 ; U4.10 93.01,54.8 ; U4.10 94.07,55.85 ; 18.81,73.98 J2.6 20.09,72.7 ; J6.14 69.07,5.01 ; 38.41,77.8 J5.6 39.69,76.52 ; 28.12,26.88 27.82,26.57 7.83,26.57 v1(6.12,24.88) ; J6.12 69.07,7.55 ; J6.10 69.07,10.09 ; J6.4 69.07,17.71 ; J6.8 69.07,12.63 ; v1(8.62,17.43) 8.68,17.43 ; 67.79,1.19 J6.16 69.07,2.47 ; 6.14,28.39 6.14,29.67
  BOTTOM w0.3: 80.08,29.38 v1(78.38,29.38) 78.33,29.38 ; 80.08,29.38 80.08,33.23 77.58,35.73 77.58,38.98 ; 80.08,29.38 82.12,29.38 ; C3.1 25.27,7.47 26.12,6.62 v1(27.03,6.62) ; C3.1 25.27,8.38 ; C3.1 25.27,8.38 ; C5.2 7.23,74.5 7.28,74.47 7.28,73.58 6.22,72.53 3.62,72.53 3.62,72.5 SW3.2 ; 51.17,65.22 51.17,64.47 C40.2 ; 51.17,65.22 51.17,65.38 51.42,65.62 52.42,65.62 53.62,64.42 v1(53.62,64.38) ; 51.17,65.22 50.77,65.22 50.58,65.42 44.73,65.42 44.67,65.38 44.67,64.47 C37.2 ; C13.2 74.03,29.82 74.03,28.88 74.67,28.23 75.72,28.23 75.83,28.32 75.83,28.73 ; C12.2 84.12,30.45 84.12,30.43 84.12,29.52 83.47,28.88 82.22,28.88 82.12,28.98 82.12,29.38 ; 83.97,60.3 U11.2 85.03,60.3 87.12,60.42 ; C66.2 75.03,62 75.08,62.08 75.08,62.92 74.58,63.42 74.28,63.42 v1(74.2,63.38) ; 75.83,28.73 75.67,28.73 75.62,28.77 75.62,29.68 75.62,29.7 C16.2 ; 75.83,28.73 77.67,28.73 78.33,29.38 ; 30.43,56.42 28.98,56.42 28.93,56.38 28.93,55.48 28.88,55.4 C33.2 ; 30.43,56.42 30.57,56.42 v1(30.88,56.12) ; 30.43,56.42 30.43,57.42 30.77,57.77 30.77,59.12 30.62,59.27 29.73,59.27 C36.2 ; Q1.1 74.64,49.44 74.62,49.48 73.72,49.48 v1(73.62,49.38) ; v1(8.12,24.62) 7.97,24.62 6.88,23.52 6.88,22.68 6.85,22.62 C102.1 ; 81.35,54.06 C17.1 81.38,53.33 81.38,54.27 v1(81.72,54.62) ; v1(55.62,60.12) 55.27,60.12 55.08,59.92 55.08,59.08 C45.2 ; C2.2 25.27,10.12 25.27,8.38 ; 81.69,30.6 C15.2 ; C15.2 82.53,30.57 82.53,29.62 82.28,29.38 82.12,29.38 ; C15.2 82.5,29.7 ; 74.03,40.62 74.03,41.58 74,41.58 C8.2 ; 74.03,40.62 72.58,40.62 72.42,40.77 72.42,41.73 72.38,41.73 C11.2 ; 74.03,40.62 74.03,40.27 75.33,38.98 77.58,38.98 ; C31.2 32.88,64.42 29.93,64.42 v1(29.88,64.38) ; 87.12,60.42 87.17,60.42 88.08,60.42 v1(88.12,60.38) ; 87.12,60.42 C14.2 ; R19.2 7.1,53.88 7.12,53.98 v1(7.12,54.88) ; 77.58,38.98 77.58,39.98 C10.2 77.53,40.08 77.53,42.17 77.47,42.23 77.47,42.92 77.53,42.98 78.62,42.98 78.65,42.93 U1.2 ; R33.1 73.62,52.27 73.62,52.33 v1(73.62,54.62) ; U1.2 77.6,42.92 ; U1.2 79.7,42.92 ; C9.2 82.31,43.4 ; C9.2 81.53,43.48 81.53,44.38 81.67,44.52 83.28,44.52 ; C9.2 80.69,43.4 ; 82.35,43.55 C7.2 83.28,43.62 83.28,44.52 ; 78.33,29.38 78.28,29.43 78.28,30.18 78.25,30.2 U2.2 U2.7 79.95,31.5 ; v1(53.48,39.67) 53.47,40.12 C47.1 ; v1(83.38,44.62) 83.28,44.52 ; R9.2 7.23,42.5 7.28,42.58 7.28,43.52 v1(7.38,43.62) ; C78.1 48.98,8.62 40.38,8.62 v1(39.38,9.62) 39.17,9.43 39.17,9.07 39.12,9.03 38.23,9.03 C71.1 ; C64.2 76.17,59.98 77.78,59.98 v1(77.88,59.88)
